# Altium PCB DFMM_2024.PcbDoc (part 1 of 2)
Units mil, origin at the board's own origin, x right, y up, seen from the top; angles counter-clockwise.
Board outline 3287.4 x 3929 mil, 4 copper layers (Top Layer, Top GND, Power Plane, Bottom GND/Signal), stack 23.756 mil thick; 158 components, 100 nets, 537 pads, 256 vias.
Unrouted connection lines stored in the file: 11.
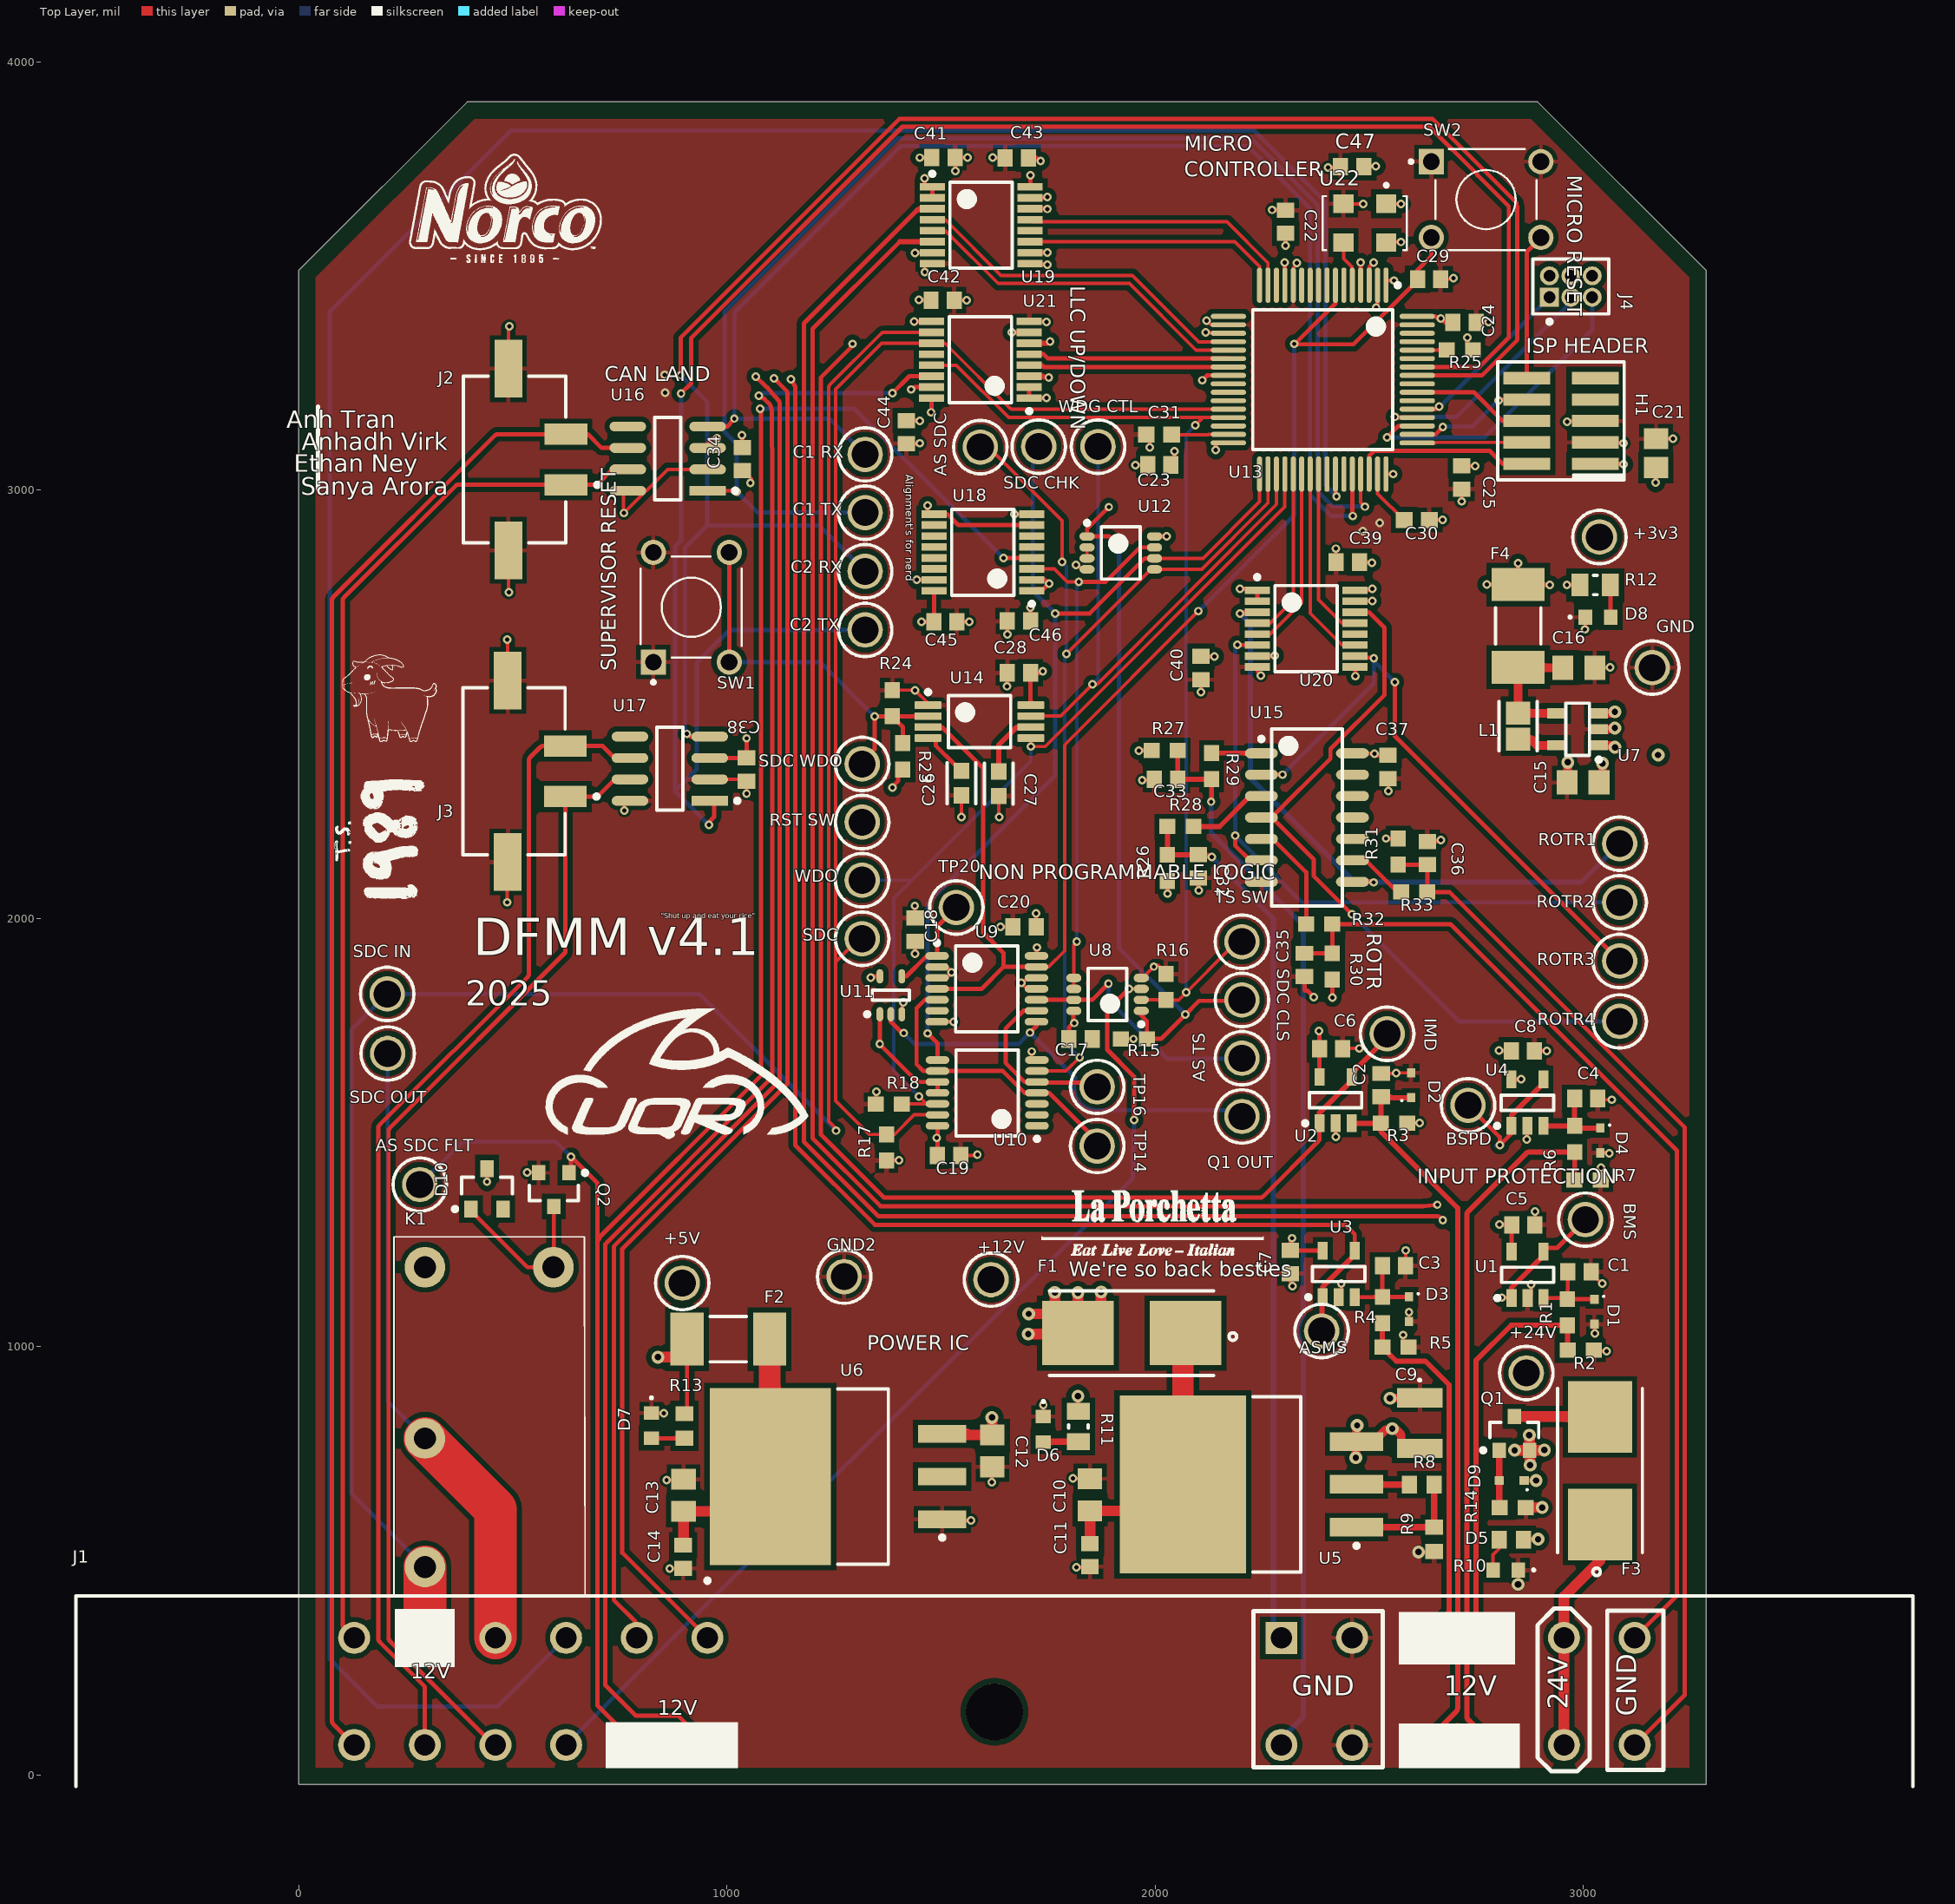
[diagram p0: Top Layer view]
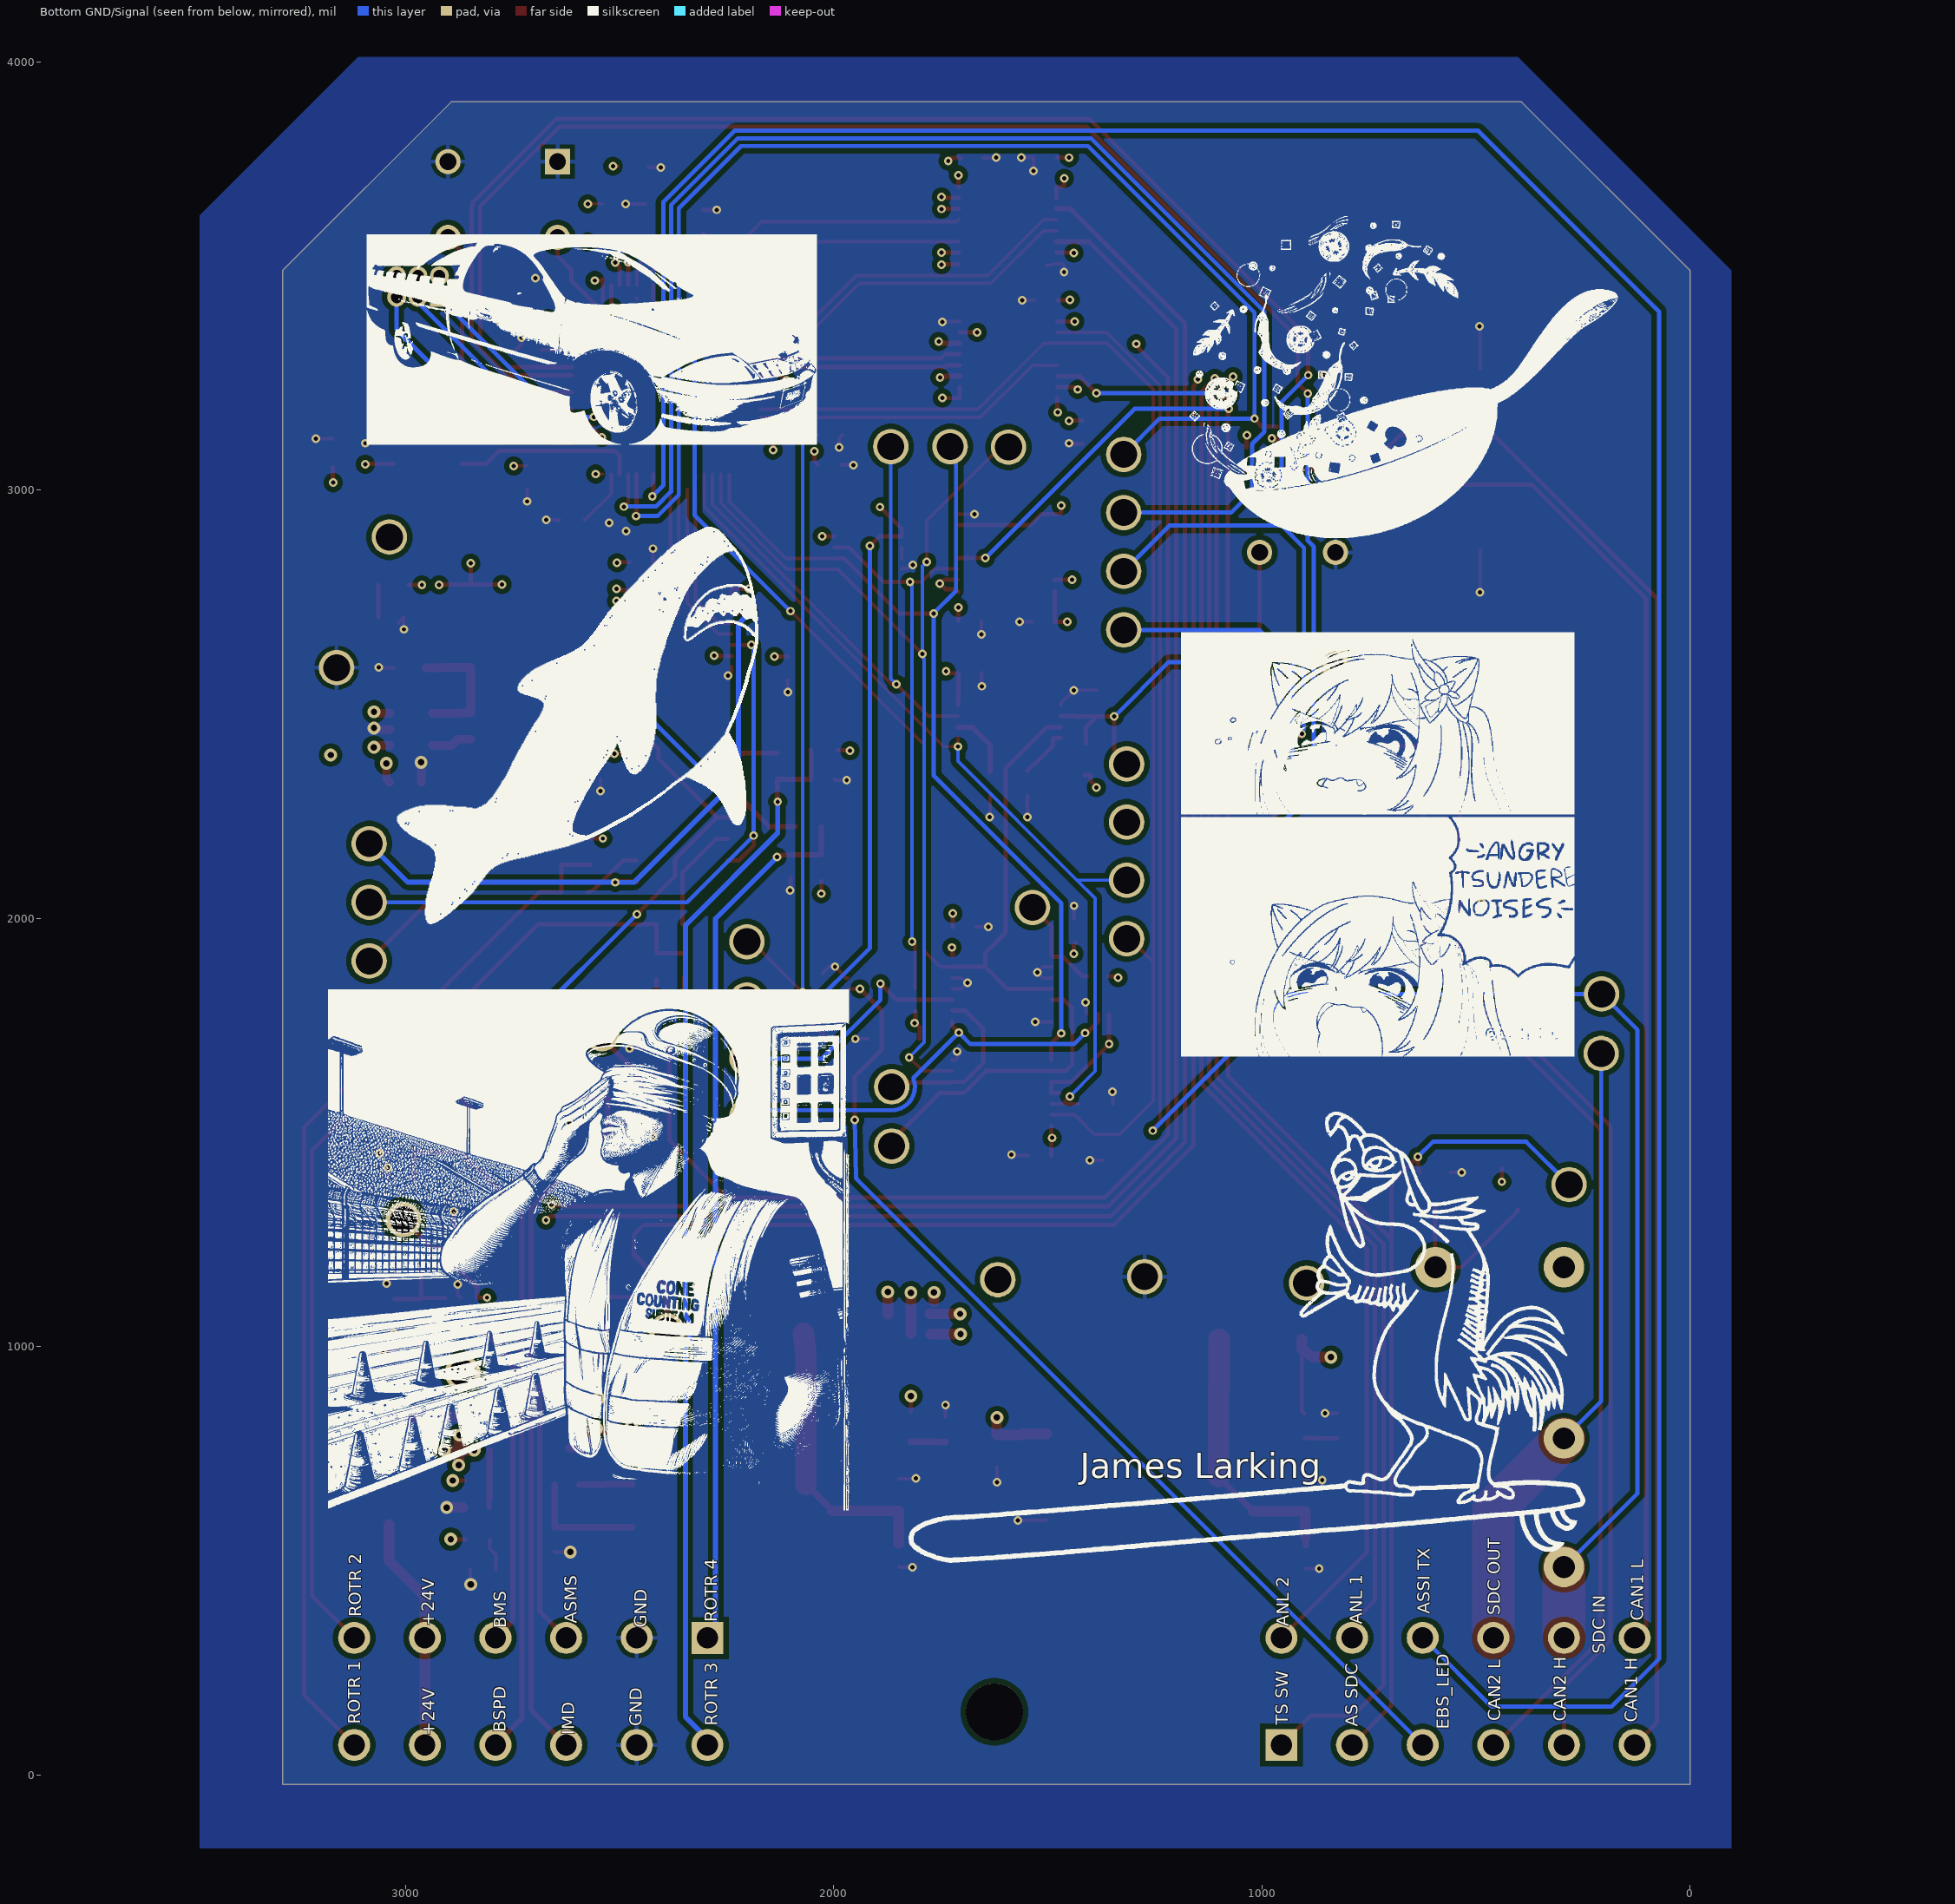
[diagram p1: Bottom GND/Signal view, seen from below]
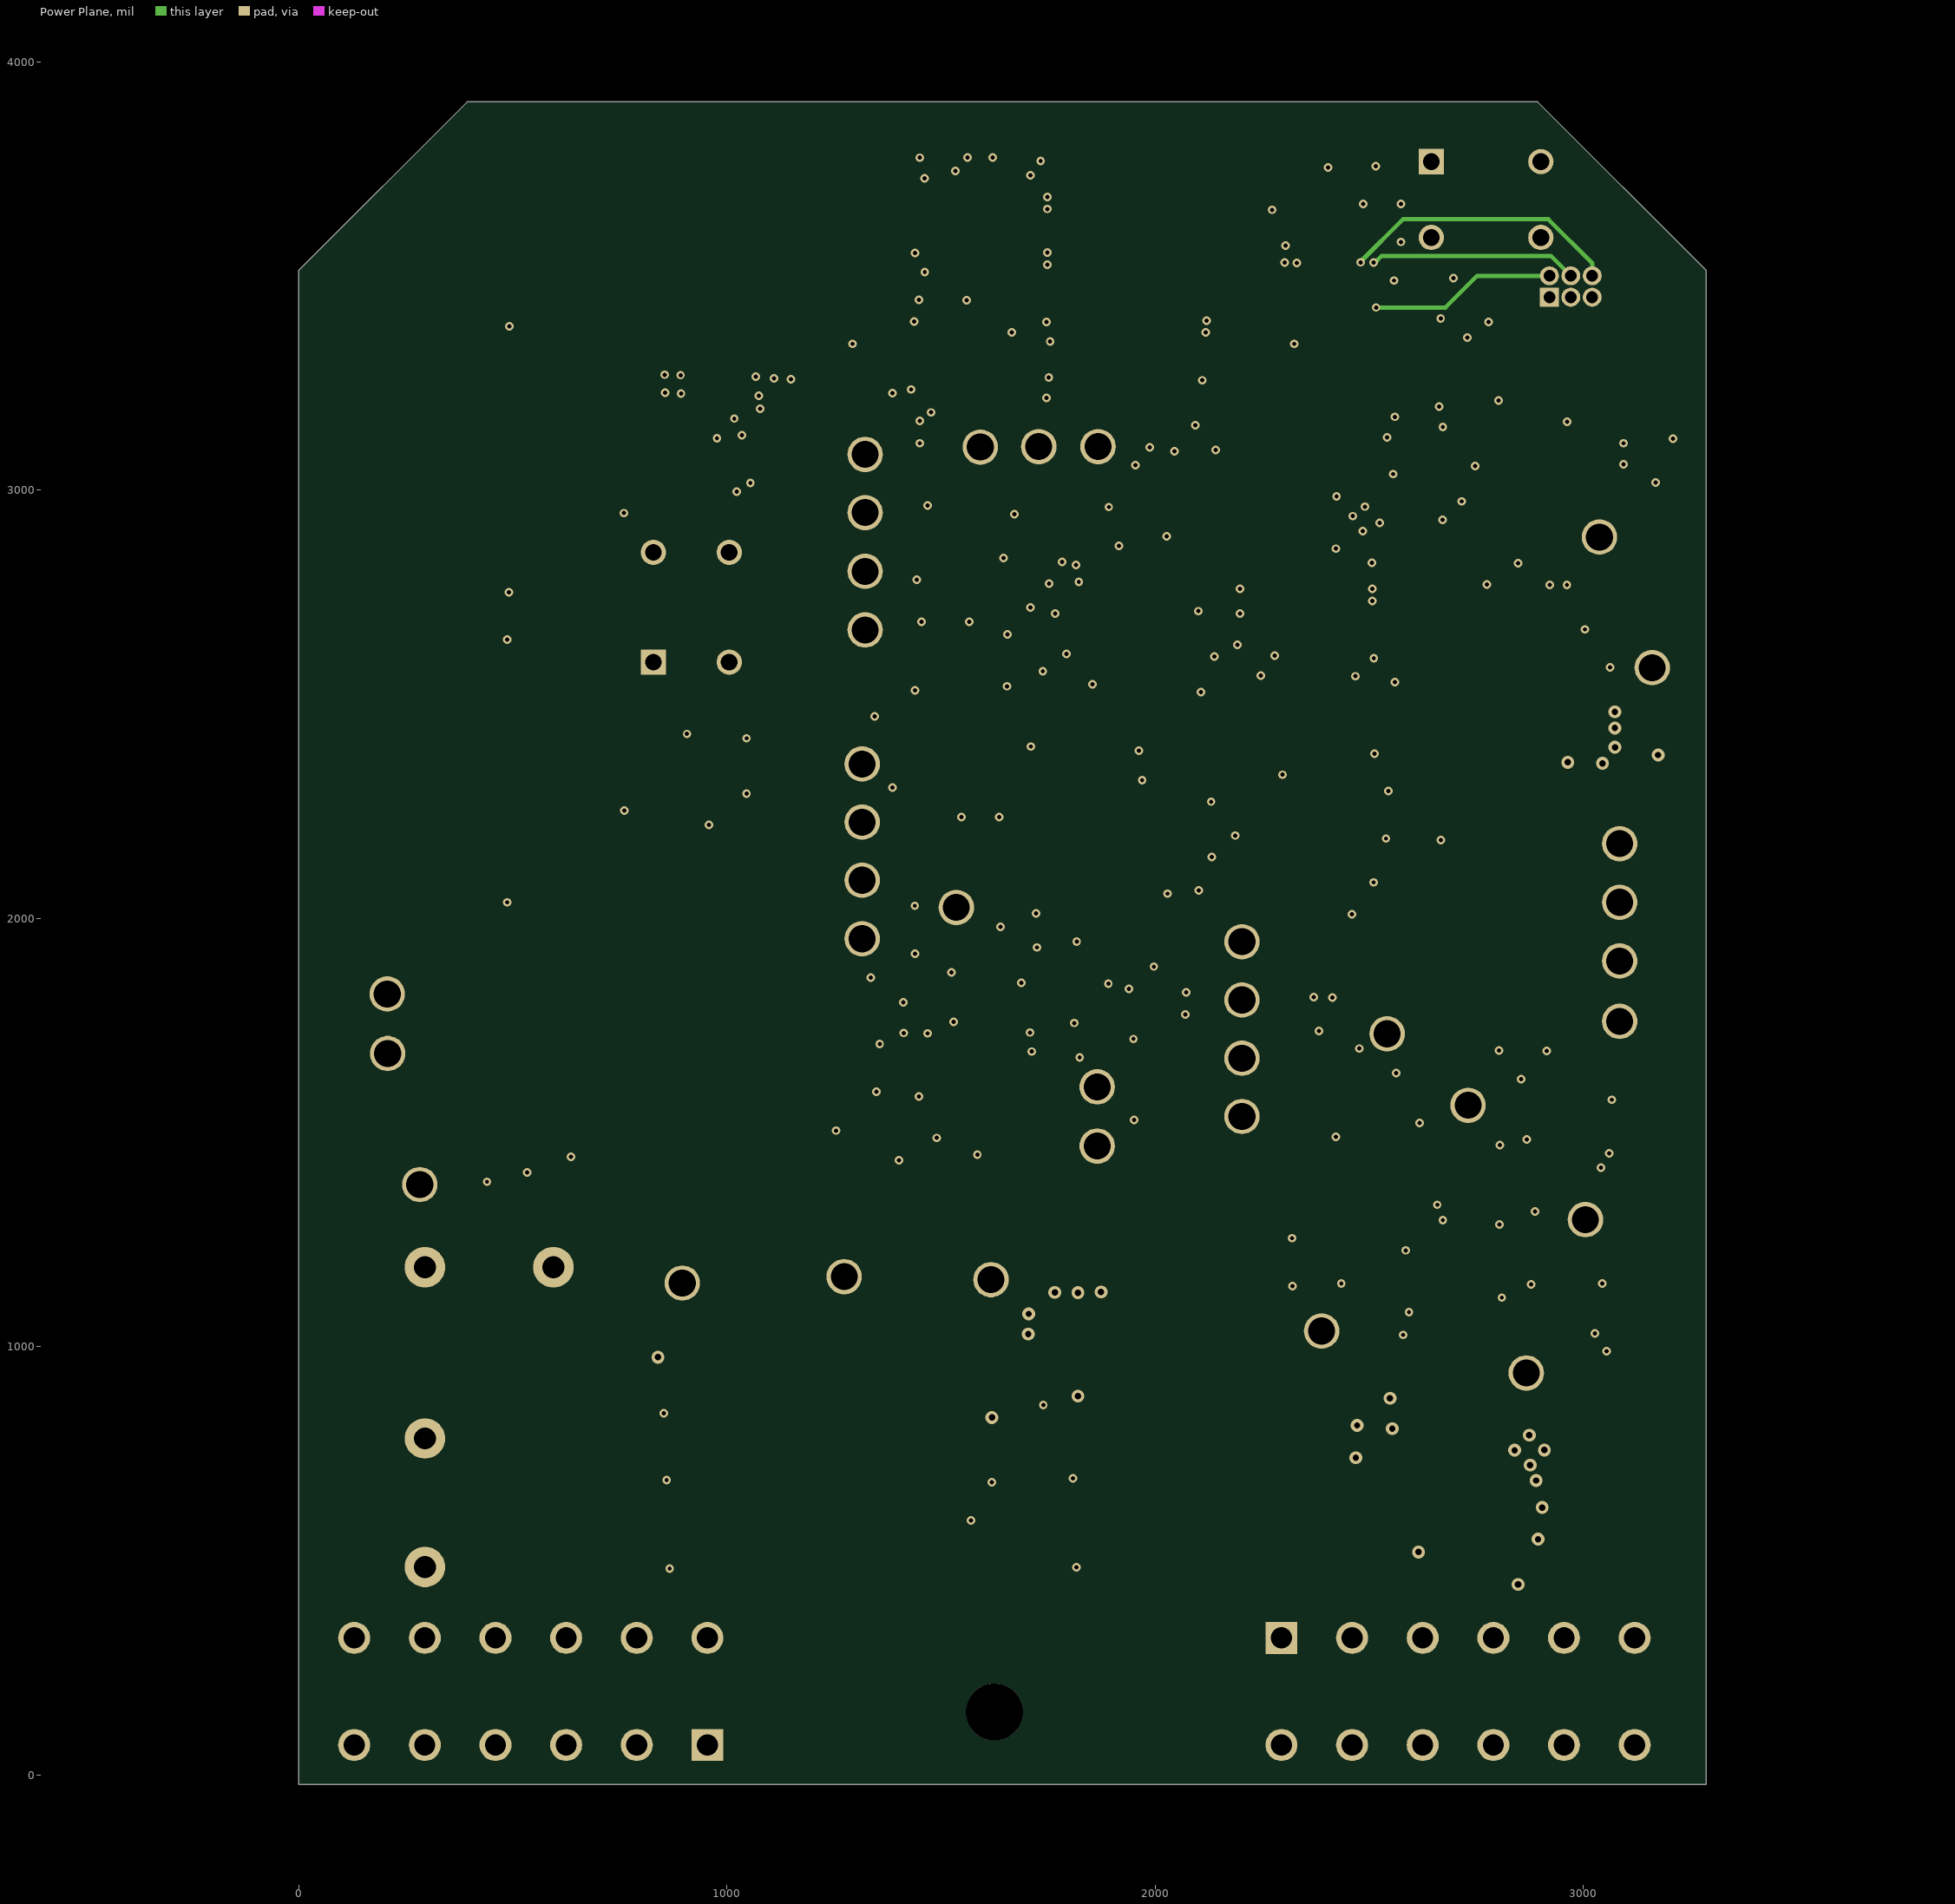
[diagram p2: Power Plane]
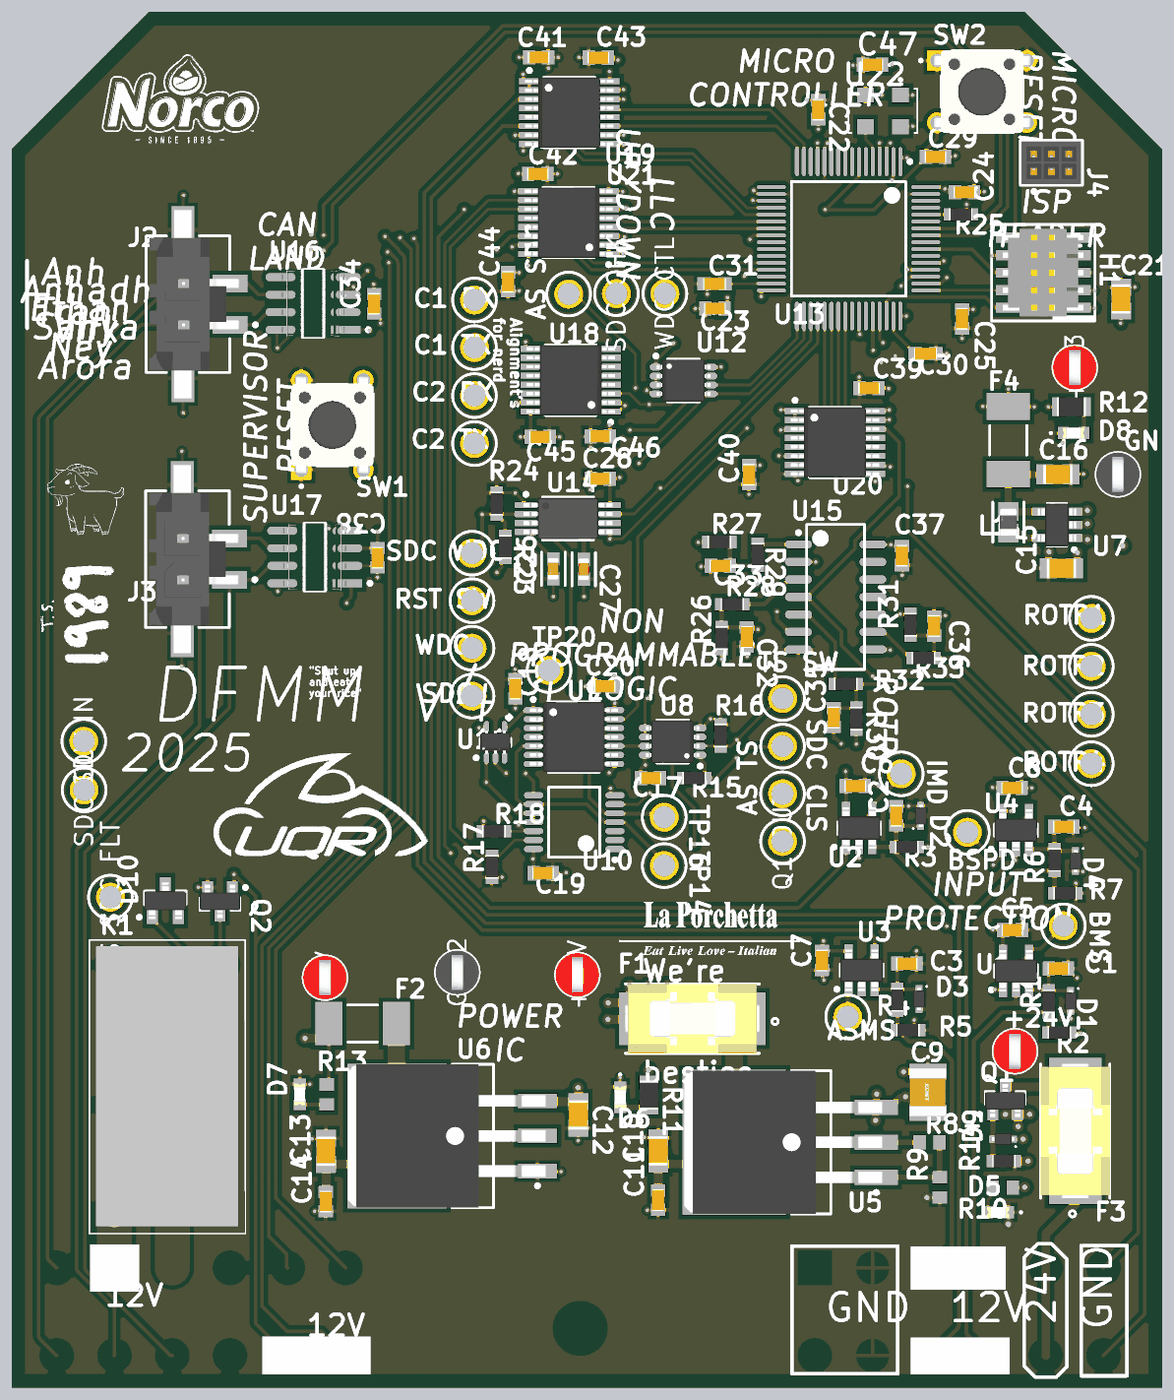
[diagram p4: 3D render of the assembled board from above, using the file's embedded part models]

## Layer stack, top to bottom
Top Solder: solder mask 0.4, Solder Resist, Dk 3.5
Top Layer: signal copper 1.4
Dielectric 2: prepreg 2.8, PP-006, Dk 4.1
Top GND: signal copper 1.378
Dielectric 1: dielectric 12.6, FR-4, Dk 4.8
Power Plane: signal copper 1.378
Dielectric 3: prepreg 2.8, PP-006, Dk 4.1
Bottom GND/Signal: signal copper 1.4
Bottom Solder: solder mask 0.4, Solder Resist, Dk 3.5

## Board outline
3287.4,3512.3 2893.7,3906 393.7,3906 0,3512.3 0,-23 3287.4,-23

## Design rules (kind name [scope] priority, off if disabled: settings)
AcuteAngle [All] p1: minimum=6.00000000000000E+0001 checktracksonly=TRUE
AssemblyTestPointUsage [(not InNetClass('NOTESTPOINTS'))] p1: allowmultiple=TRUE
AssemblyTestPointUsage AssemblyTestPointUsageN [InNetClass('NOTESTPOINTS')] p2: valid=2 allowmultiple=TRUE
AssemblyTestpoint [All] p1: testpointundercomponent=TRUE minsize=31.5 maxsize=78.74 preferedsize=39.37 minholesize=0 maxholesize=13.78 preferedholesize=0 testpointgrid=50 usegrid=FALSE gridoriginx=3444.88 gridoriginy=2460.63 gridtolerance=0.01 allowsidetop=TRUE minspacing=100 // Zollner
BoardOutlineClearance BoardCopperOutlineClearance [(OnLayer('Top Layer') OR OnLayer('Bottom Layer') )] p1: gap=19.68 ignorepadtopadclearanceinfootprint=FALSE except(39.37: Poly-OutlineEdge Region-OutlineEdge; 59.06: SMDPad-OutlineEdge THPad-OutlineEdge)
Clearance PadToViaClearance [IsVia and not IsComponentVia vs IsPad] p1: gap=1 ignorepadtopadclearanceinfootprint=TRUE
Clearance "Clearance (FAB)" [All] p2: gap=8 ignorepadtopadclearanceinfootprint=TRUE except(12: Arc-Poly Track-Poly SMDPad-Poly THPad-Poly Via-Poly Fill-Poly Poly-Poly)
ComponentClearance ComponentClearance_NetTie [((ObjectKind = 'Component') And (ComponentType = 'Net Tie')) Or (Footprint = 'StarPoint') Or (Footprint like 'NetTieVia*')] p1: gap=-150 collisioncheckmode=3 verticalgap=-150 showdistances=FALSE
ComponentClearance [All] p2: gap=10 collisioncheckmode=3 verticalgap=10 showdistances=FALSE
DiffPairsRouting [All] p1: maxlimit=50 minlimit=8 mostfreqgap=8 toplayer_minwidth=6 toplayer_maxwidth=100 toplayer_prefwidth=10 midlayer1_minwidth=6 midlayer1_maxwidth=100 midlayer1_prefwidth=10 midlayer2_minwidth=6 midlayer2_maxwidth=100 midlayer2_prefwidth=10 bottomlayer_minwidth=6 bottomlayer_maxwidth=100 bottomlayer_prefwidth=10 maxuncoupledlength=500
FabricationTestPointUsage [All] p1: valid=2 allowmultiple=FALSE
FabricationTestpoint [All] p1: side=3 testpointundercomponent=TRUE minsize=40 maxsize=100 preferedsize=60 minholesize=0 maxholesize=40 preferedholesize=32 testpointgrid=1 allowsidetop=TRUE allowsidebottom=TRUE usegrid=FALSE gridtolerance=0.01
HoleSize [All] p1: absolutevalues=TRUE maxlimit=250 minlimit=11.81 maxpercent=80.000 minpercent=20.000 // Zollner
HoleToHoleClearance HoleToHoleClearance_NetTieVia [InPadClass('NetTieVias') vs InPadClass('NetTieVias')] p1: gap=0 allowstackedmicrovias=TRUE
HoleToHoleClearance [All] p2: gap=9.84 allowstackedmicrovias=TRUE // Zollner
MinimumAnnularRing [All] p1: minimumring=5.91 // PCBWAY
MinimumSolderMaskSliver [All] p1: minsoldermaskwidth=7.87 // Zollner
PlaneClearance PlaneClearance_1 [All] p1: clearance=20
PlaneConnect [All] p1: pad.planeconnectstyle=Relief pad.reliefexpansion=20 pad.reliefentries=4 pad.reliefconductorwidth=10 pad.reliefairgap=10 via.planeconnectstyle=Direct via.reliefexpansion=20 via.reliefentries=4 via.reliefconductorwidth=10 via.reliefairgap=10
PolygonConnect DirectConnect [InNetClass('All Nets') vs InNetClass('All Nets')] p1: thpad.connectstyle=Relief thpad.reliefconductorwidth=10 thpad.reliefentries=4 thpad.polygonreliefangle="90 Angle" thpad.airgapwidth=10 smdpad.connectstyle=Direct smdpad.reliefconductorwidth=10 smdpad.reliefentries=4 smdpad.polygonreliefangle="90 Angle" smdpad.airgapwidth=10 via.connectstyle=Direct via.reliefconductorwidth=10 via.reliefentries=4 via.polygonreliefangle="90 Angle" via.airgapwidth=10
PolygonConnect [All] p2: thpad.connectstyle=Relief thpad.reliefconductorwidth=10 thpad.reliefentries=4 thpad.polygonreliefangle="90 Angle" thpad.airgapwidth=10 smdpad.connectstyle=Relief smdpad.reliefconductorwidth=10 smdpad.reliefentries=4 smdpad.polygonreliefangle="90 Angle" smdpad.airgapwidth=10 via.connectstyle=Direct via.reliefconductorwidth=10 via.reliefentries=4 via.polygonreliefangle="90 Angle" via.airgapwidth=10
RoutingVias SmallVias [All] p1: holewidth=10 width=20 viastyle="Through Hole" minholewidth=10 minwidth=20 maxholewidth=28 maxwidth=50
RoutingVias [All] p2: holewidth=13.78 width=27.56 viastyle="Through Hole" minholewidth=11.81 minwidth=23.62 maxholewidth=50 maxwidth=50
SMDEntry [not IsTestpoint] p1: side=TRUE corner=TRUE anyangle=FALSE
SMDNeckDown [not IsTestpoint] p1: percent=90.000
SMDToCorner [All] p1: distance=10000
SMDToPlane [All] p1: distance=0
ShortCircuit [All vs not IsBoardCutoutRegion] p1: allowed=FALSE
SilkToSolderMaskClearance [IsPad] p1: minsilkscreentomaskgap=5 clearancetoexposedcopper=TRUE
SolderMaskExpansion SolderMaskExpansion_Via [IsVia] p1: expansion=4 istentingtop=TRUE
SolderMaskExpansion [All] p2: expansion=1.97 istentingtop=FALSE // Zollner
SolderMaskExpansion SolderMaskExpansionToHoles [All] p3: expansion=3.94 istentingtop=FALSE soldermaskfromhole=TRUE // Zollner
UnRoutedNet [All] p1: checkbadconnections=TRUE
Width [All] p1: maxlimit=500 minlimit=8 preferedwidth=10
16 further rules are at their usual default settings.

## Classes and differential pairs
component class U_Non_Prog_Logic: "AS SDC" "AS SDC FLT" "AS TS" C17 C18 C19 C20 D10 K1 "Q1 Out" Q2 R15 R16 R17 R18 "RST SW" SDC "SDC CHK" "SDC CLS" TP14 TP16 TP20 "TS SW" U8 U9 U10 U11 U12 WDO
component class U_Microcontroller: "C1 RX" "C1 TX" "C2 RX" "C2 TX" C21 C22 C23 C24 C25 C26 C27 C28 C29 C30 C31 C32 C33 C34 C35 C36 C37 C38 C39 C40 C41 C42 C43 C44 C45 C46 C47 H1 J2 J3 J4 R23 R24 R26 R27 R28 R29 R30 R31 R32 R33 ROTR1 ROTR2 ROTR3 ROTR4 "SDC WDO" SW1 SW2 U13 U14 U15 U16 U17 U18 U19 U20 U21 U22 "WDG CTL"
component class DFMM_2024: +3v3 +5V +12V +24V ASMS BMS BSPD C1 C2 C3 C4 C5 C6 C7 C8 C9 C10 C11 C12 C13 C14 C15 C16 D1 D2 D3 D4 D5 D6 D7 D8 D9 F1 F2 F3 F4 GND GND2 IMD J1 L1 Q1 R1 R2 R3 R4 R5 R6 R7 R8 R9 R10 R11 R12 R13 R14 "SDC IN" "SDC OUT" U1 U2 U3 U4 U5 U6 U7

## Components (designator, comment, footprint, x,y, rotation, side; value= is the part's Value field where it differs from the comment)
+3v3 "5010" KSTN-5010_V 3037.84,2889.89 r90 top
+5V "5010" KSTN-5010_V 896,1148 r90 top
+12V "5010" KSTN-5010_V 1617,1156 r90 top
+24V "5010" KSTN-5010_V 2867,938 r90 top
"AS SDC" "5012" KSTN-5012_V 1592,3100 r90 top
"AS SDC FLT" "5012" KSTN-5012_V 283,1378 r90 top
"AS TS" "5012" KSTN-5012_V 2203,1673 r90 top
ASMS "5012" KSTN-5012_V 2389,1036 r90 top
BMS "5012" KSTN-5012_V 3005,1296 r90 top
BSPD "5012" KSTN-5012_V 2731,1563 r90 top
C1 "CL10B104KB8NNWC" CAPC1608X09M 2990.96,1174.43 r180 top value=0.1uF
"C1 RX" "5012" KSTN-5012_V 1323,3083 r90 top
"C1 TX" "5012" KSTN-5012_V 1323,2947 r90 top
C2 "CL10B104KB8NNWC" CAPC1608X09M 2528,1610.17 r270 top value=0.1uF
"C2 RX" "5012" KSTN-5012_V 1323,2810 r90 top
"C2 TX" "5012" KSTN-5012_V 1323,2673 r90 top
C3 "CL10B104KB8NNWC" CAPC1608X09M 2558.18,1188.36 r180 top value=0.1uF
C4 "CL10B104KB8NNWC" CAPC1608X09M 3006.83,1579 r180 top value=0.1uF
C5 "CL10B104KB8NNWC" CAPC1608X09M 2859.83,1284 r180 top value=0.1uF
C6 "CL10B104KB8NNWC" CAPC1608X09M 2411,1695 r180 top value=0.1uF
C7 "CL10B104KB8NNWC" CAPC1608X09M 2316,1197 r90 top value=0.1uF
C8 "CL10B104KB8NNWC" CAPC1608X09M 2858.83,1690 r180 top value=0.1uF
C9 "C1210C106K3RACAUTO" C1210 2618,821 r270 top
C10 "CL21A106KOQNNNE" CAPC2012X14N#1 1848,653.6 r90 top value=10uF
C11 "CL10B104KB8NNWC" CAPC1608X09M 1848,512.83 r90 top value=0.1uF
C12 "CL21A106KOQNNNE" CAPC2012X14N#1 1620,756 r270 top value=10uF
C13 "CL21A106KOQNNNE" CAPC2012X14N#1 899,652.4 r90 top value=10uF
C14 "CL10B104KB8NNWC" CAPC1608X09M 898,508.83 r90 top value=0.1uF
C15 "CL21A106KOQNNNE" CAPC2012X14N#1 2999.6,2317 r180 top value=10uF
C16 "CL21A226MQQNNNE" CAPC2012X14N#1 2989.6,2585 r0 top value=22uF
C17 "CL10B104KB8NNWC" CAPC1608X09M 1826,1718 r0 top value=0.1uF
C18 "CL10B104KB8NNWC" CAPC1608X09M 1440,1973 r90 top value=0.1uF
C19 "CL10B104KB8NNWC" CAPC1608X09M 1519,1446 r0 top value=0.1uF
C20 "CL10B104KB8NNWC" CAPC1608X09M 1695.17,1980 r180 top value=0.1uF
C21 "CL21A475KAQNNNE" CAPC2012X14N#2 3170,3086 r90 top value=4.7uF
C22 "CL10B104KB8NNWC" CAPC1608X09M 2305,3626.33 r270 top value=0.1uF
C23 "CL10B104KB8NNWC" CAPC1608X09M 2009.81,3058.5 r0 top value=0.1uF
C24 "CL10B104KB8NNWC" CAPC1608X09M 2723,3391 r180 top value=0.1uF
C25 "CL10B104KB8NNWC" CAPC1608X09M 2716,3029.17 r90 top value=0.1uF
C26 "GCM1885C1H392JA16D" FP-GCM188-0_1-IPC_B 1548,2315.39 r270 top value=3.9nF
C27 "GCM1885C1H392JA16D" FP-GCM188-0_1-IPC_B 1635,2314 r270 top value=3.9nF
C28 "CL10B104KB8NNWC" CAPC1608X09M 1682,2573 r180 top value=0.1uF
C29 "CL10B104KB8NNWC" CAPC1608X09M 2640,3492 r180 top value=0.1uF
C30 "CL10A225KO8NNNC" CAPC1608X09N 2611.47,2930 r0 top value=2.2uF
C31 "CL10A225KO8NNNC" CAPC1608X09N 2009,3129 r180 top value=2.2uF
C32 "CL10B104KB8NNWC" CAPC1608X09M 2101,2120.83 r90 top value=0.1uF
C33 "CL10B104KB8NNWC" CAPC1608X09M 2025.83,2324 r0 top value=0.1uF
C34 "CL10B104KB8NNWC" CAPC1608X09M 1036,3072 r270 top value=0.1uF
C35 "CL10B104KB8NNWC" CAPC1608X09M 2349,1890.83 r90 top value=0.1uF
C36 "CL10B104KB8NNWC" CAPC1608X09M 2636,2152.17 r270 top value=0.1uF
C37 "CL10B104KB8NNWC" CAPC1608X09M 2544,2353 r90 top value=0.1uF
C38 "CL10B104KB8NNWC" CAPC1608X09M 1046,2347 r270 top value=0.1uF
C39 "CL10B104KB8NNWC" CAPC1608X09M 2450.17,2831.41 r180 top value=0.1uF
C40 "CL10B104KB8NNWC" CAPC1608X09M 2107,2584 r270 top value=0.1uF
C41 "CL10B104KB8NNWC" CAPC1608X09M 1506.17,3776 r180 top value=0.1uF
C42 "CL10B104KB8NNWC" CAPC1608X09M 1504.17,3443 r180 top value=0.1uF
C43 "CL10B104KB8NNWC" CAPC1608X09M 1677,3775 r180 top value=0.1uF
C44 "CL10B104KB8NNWC" CAPC1608X09M 1419,3135 r270 top value=0.1uF
C45 "CL10B104KB8NNWC" CAPC1608X09M 1510.33,2692 r180 top value=0.1uF
C46 "CL10B104KB8NNWC" CAPC1608X09M 1682.17,2694 r180 top value=0.1uF
C47 "CL10B104KB8NNWC" CAPC1608X09M 2460,3755 r0 top value=0.1uF
D1 "PZS1116BES_R1_00001" SODFL160X65-2N 3026,1081.13 r270 top
D2 "PZS1116BES_R1_00001" SODFL160X65-2N 2598,1609.94 r90 top
D3 "PZS1116BES_R1_00001" SODFL160X65-2N 2593,1087.13 r270 top
D4 "PZS1116BES_R1_00001" SODFL160X65-2N 3040,1481 r270 top
D5 "LTST-C191KGKT" LTST-C191KSKT 2819,478 r0 top
D6 "LTST-C191KGKT" LTST-C191KSKT 1739,806.57 r90 top
D7 "LTST-C191KGKT" LTST-C191KSKT 824,815 r90 top
D8 "LTST-C191KGKT" LTST-C191KSKT 3034.43,2703 r180 top
D9 "PZS1116BES_R1_00001" SODFL160X65-2N 2833,687 r180 top
D10 "BAT54LT1G" SOT95P237X111-3N 440,1368 r90 top
F1 "0154001.DR" 0154001.DRFP 1945.41,1031 r180 top
F2 "0452.500MRL" LFUS-0452_V 1003.54,1017 r180 top
F3 "0154001.DR" 0154001.DRFP 3039,710 r90 top
F4 "0452.500MRL" LFUS-0452_V 2848,2682.46 r90 top
GND "5011" KSTN-5011_V 3161,2585 r90 top
GND2 "5011" KSTN-5011_V 1274,1163 r90 top
H1 "miniSWD" miniSWD-Footprint-1 2948,3161 r90 top
IMD "5012" KSTN-5012_V 2542,1730 r90 top
J1 "DTM13-12PA-12PB" DTM13-12PA-12PB-Footprint-1 1624.92,-334.35 r0 top locked
J2 "43650-0225" FP-43650-0225-MFG 504.57,3071.01 r270 top
J3 "43650-0225" FP-43650-0225-MFG 502.92,2343.06 r270 top
J4 "M50-3000345" FP-M50-3000345-MFG 2971,3475 r0 top
K1 "G5Q-1A4 DC12" "G5Q-1A4 DC12" 295,1185 r270 top
L1 "MLP2012S1R0MT0S1" FP-MLZ2012-0_85-IPC_B 2848,2448.45 r90 top
Q1 "DMP3098L-7" SOT90P240X110-3N 2839,797 r90 top
"Q1 OUT" "5012" KSTN-5012_V 2203,1537 r90 top
Q2 "DMN6075S-7" SOT90P240X110-3N 596,1366 r270 top
R1 "ESR03EZPJ103" RESC1608X06N 2963.01,1079.94 r90 top value=10k
R2 "ESR03EZPJ103" RESC1608X06N 2994,991 r180 top value=10k
R3 "RC0603FR-072K2L" RESC1608X06N 2558,1521 r180 top value=2.2k
R4 "ESR03EZPJ103" RESC1608X06N 2531.02,1085.02 r90 top value=10k
R5 "ESR03EZPJ103" RESC1608X06N 2561.49,998.13 r180 top value=10k
R6 "ESR03EZPJ103" RESC1608X06N 2980,1484.49 r90 top value=10k
R7 "ESR03EZPJ103" RESC1608X06N 3010,1389 r180 top value=10k
R8 "121" RESC1608X55X30ML15T15 2623,677.54 r0 top
R9 "1.05k" RESC1608X55X30ML15T15 2652,549.54 r270 top
R10 "1.05k" RESC1608X55X30ML15T15 2832,549 r180 top
R11 "RC0805JR-07510RL" RESC2012X06N 1821,813 r90 top value=510
R12 "RC0805FR-0780R6L" RESC2012X06N 3028,2778 r180 top value=80
R13 "121" RESC1608X55X30ML15T15 901,814.46 r270 top
R14 "RNCP0603FTD1K00" RESC1608X06N 2835.51,624 r180 top value=1K
R15 "ESR03EZPJ103" RESC1608X06N 1950.49,1718 r180 top value=10k
R16 "ESR03EZPJ103" RESC1608X06N 2026,1839.51 r90 top value=10k
R17 "ESR03EZPJ103" RESC1608X06N 1373,1464.49 r270 top value=10k
R18 "ESR03EZPJ103" RESC1608X06N 1378.49,1566 r180 top value=10k
R23 "RC0603FR-071ML" RESC1608X06N 1411,2378 r270 top value=1M
R24 "RC0603FR-102ML" RESC1608X06N 1386,2502 r270 top value=2M
R25 "ESR03EZPJ103" RESC1608X06N 2712,3327 r180 top value=10k
R26 "ESR03EZPJ103" RESC1608X06N 2029,2117.49 r90 top value=10k
R27 "ESR03EZPJ103" RESC1608X06N 2022.49,2392 r0 top value=10k
R28 "ESR03EZPJ103" RESC1608X06N 2059.49,2214 r0 top value=10k
R29 "ESR03EZPJ103" RESC1608X06N 2132,2355 r90 top value=10k
R30 "ESR03EZPJ103" RESC1608X06N 2414,1887.49 r90 top value=10k
R31 "ESR03EZPJ103" RESC1608X06N 2568,2155.51 r270 top value=10k
R32 "ESR03EZPJ103" RESC1608X06N 2383.49,1986 r180 top value=10k
R33 "ESR03EZPJ103" RESC1608X06N 2605.49,2061 r180 top value=10k
ROTR1 "5012" KSTN-5012_V 3085,2174 r90 top
ROTR2 "5012" KSTN-5012_V 3085,2037 r90 top
ROTR3 "5012" KSTN-5012_V 3085,1900 r90 top
ROTR4 "5012" KSTN-5012_V 3085,1759 r90 top
"RST SW" "5012" KSTN-5012_V 1316,2224.33 r90 top
SDC "5012" KSTN-5012_V 1316,1952 r90 top
"SDC CHK" "5012" KSTN-5012_V 1728.5,3101 r90 top
"SDC CLS" "5012" KSTN-5012_V 2203,1809 r90 top
"SDC IN" "5012" KSTN-5012_V 207,1823 r90 top
"SDC OUT" "5012" KSTN-5012_V 208,1684 r90 top
"SDC WDO" "5012" KSTN-5012_V 1316,2360 r90 top
SW1 "1825910-6" SW1825910-6 917,2726 r90 top
SW2 "1825910-6" SW1825910-6 2773,3678 r0 top
TP14 "5012" KSTN-5012_V 1865,1468 r90 top
TP16 "5012" KSTN-5012_V 1865,1606 r90 top
TP20 "5012" KSTN-5012_V 1536,2025 r90 top
"TS SW" "5012" KSTN-5012_V 2203,1945 r90 top
U1 "TLV271CW5-7" SOT95P285X130-5N 2870,1167.13 r90 top
U2 "TLV271CW5-7" SOT95P285X130-5N 2421.6,1575.13 r90 top
U3 "TLV271CW5-7" SOT95P285X130-5N 2429,1169.13 r90 top
U4 "TLV271CW5-7" SOT95P285X130-5N 2869.6,1569.13 r90 top
U5 "LM1085IS-ADJ/NOPB" KTT0003B_M 2224.45,678 r180 top
U6 "LM1085ISX-5.0/NOPB" KTT0003B_N 1259,696 r180 top
U7 "SC189ZSKTRT" SOT95P280X145-5N 2987,2441 r180 top
U8 "74HCT2G00DP,125" TSOP65P400X110-8N 1889,1822 r180 top
U9 "SN74HCS74QBQARQ1" TSOP65P640X120-14N 1607,1835 r0 top
U10 "74HCT08PW118" TSOP65P640X110-14N 1608,1592 r180 top
U11 "74AHCT1G32GW125" TSOP65P210X110-6N 1383,1820 r90 top
U12 "74HC2G08DP,125" TSOP65P490X108-8N 1920,2853 r0 top
U13 "STM32F415RGT6" STM-LQFP64_M 2391.73,3257.53 r270 top
U14 "UCC2946TPWRQ1" PW0008A_M 1590,2459 r0 top
U15 "CD40106BM96E4" D0014A_L 2354.7,2235 r0 top
U16 "SN65HVD233QDRQ1" FP-D0008A-IPC_B 862,3073 r180 top
U17 "SN65HVD233QDRQ1" FP-D0008A-IPC_B 867,2349 r180 top
U18 "CD40109BPWR" TSOP65P640X120-16N 1598,2854 r180 top
U19 "CD40109BPWR" TSOP65P640X120-16N 1594,3618 r0 top
U20 "CD40109BPWR" TSOP65P640X120-16N 2352.83,2676.2 r0 top
U21 "CD40109BPWR" TSOP65P640X120-16N 1592,3304 r180 top
U22 "ASFLMB-24.000MHZ-XY-T" XTAL_ASFLMB-24.000MHZ-XY-T 2490,3623 r270 top
"WDG CTL" "5012" KSTN-5012_V 1867,3101 r90 top
WDO "5012" KSTN-5012_V 1316,2088.67 r90 top

## Footprints (in the part's own frame and the unit in brackets; to place one, negate y for a bottom-side part, rotate by r counter-clockwise, add the part's x,y. Pads: shape width x height; smd on the part's side, far side on the other; paste and mask are expansions set on the pad)
0154001.DRFP [mm]
  rect 4.24x3.81 smd: 1(-3.19,0) 2(3.19,0)
  silkscreen extent -6.22,-2.51 4.86,2.51, body extent -4.86,-2.51 4.86,2.51, height 3.81
C1210 [mm]
  rect 1.15x2.7 smd: 1(-1.5,0) 2(1.5,0)
  silkscreen extent -2.6,-0.05 -2.5,0.05, body extent -1.75,-1.36 1.75,1.36, height 2.8
CAPC1608X09M [mm] "Chip Capacitor, 2-Leads, Body 1.55x0.80mm, IPC Low Density"
  rect 0.9x1.04 smd: 1(-0.69,0) 2(0.69,0)
  body extent -0.8,-0.45 0.8,0.45, height 0.9
CAPC1608X09N [mm] "Chip Capacitor, 2-Leads, Body 1.60x0.80mm, IPC Medium Density"
  rect 1x0.95 smd: 1(-0.75,0) 2(0.75,0)
  body extent -0.85,-0.45 0.85,0.45, height 0.9
CAPC2012X14N#1 [mm] "Chip Capacitor, 2-Leads, Body 2.00x1.25mm, IPC Medium Density"
  rect 1.25x1.45 smd: 1(-0.95,0) 2(0.95,0)
  body extent -1.07,-0.7 1.07,0.7, height 1.4
CAPC2012X14N#2 [mm] "Chip Capacitor, 2-Leads, Body 2.00x1.25mm, IPC Medium Density"
  rect 1.25x1.45 smd: 1(-0.85,0) 2(0.85,0)
  body extent -1.07,-0.7 1.07,0.7, height 1.4
D0014A_L [mm] "SOIC, 14-Leads, Body 8.75x4mm, Pitch 1.27mm, IPC High Density"
  oval 1.95x0.6 smd: 1(-2.7,3.81) 2(-2.7,2.54) 3(-2.7,1.27) 4(-2.7,0) 5(-2.7,-1.27) 6(-2.7,-2.54) 7(-2.7,-3.81) 8(2.7,-3.81) 9(2.7,-2.54) 10(2.7,-1.27) 11(2.7,0) 12(2.7,1.27) 13(2.7,2.54) 14(2.7,3.81)
  silkscreen extent -2.82,-5.25 2.1,5.25, body extent -2.5,-5.25 2.5,5.25, height 2
DTM13-12PA-12PB-Footprint-1 [mm]
  rect 1.9x1.9 hole 1.25 paste-2539.97 mask+0: A1(-17.025,10.255) B1(17.025,16.605)
  round 1.9 hole 1.25 paste-2539.97 mask+0: A2(-21.215,10.255) A3(-25.405,10.255) A4(-29.595,10.255) A5(-33.785,10.255) A6(-37.975,10.255) A7(-37.975,16.605) A8(-33.785,16.605) A9(-29.595,16.605) A10(-25.405,16.605) A11(-21.215,16.605) A12(-17.025,16.605) B2(21.215,16.605) B3(25.405,16.605) B4(29.595,16.605) B5(33.785,16.605) B6(37.975,16.605) B7(37.975,10.255) B8(33.785,10.255) B9(29.595,10.255) B10(25.405,10.255) B11(21.215,10.255) B12(17.025,10.255)
  round 3.38 hole 3.38 unplated paste-2539.97 mask+0: ""(0,12.215)
  silkscreen extent -54.47,7.81 54.47,20.12, body extent -54.57,-19.2 54.57,19.2, height 0.25
FP-43650-0225-MFG [mm]
  rect 1.27x2.54 smd paste+0 mask+0: 1(1.5,3.05) 2(-1.5,3.05)
  rect 3.43x1.65 smd paste+0 mask+0: 3(-5.385,-0.37) 4(5.385,-0.37)
  silkscreen extent -4.95,-3.04 4.95,5.02, body extent -7.2,-3.14 7.2,4.42, height 0.25
FP-D0008A-IPC_B [mil]
  rect 85.4x22.92 smd paste+0 mask+0: 1(-93.06,75)
  rrect100% 85.4x22.92 smd paste+0 mask+0: 2(-93.06,25) 3(-93.06,-25) 4(-93.06,-75) 5(93.06,-75) 6(93.06,-25) 7(93.06,25) 8(93.06,75)
  silkscreen extent -162,-97 31,97, body extent -146,-106 146,106, height 10
FP-GCM188-0_1-IPC_B [mil]
  rect 37.74x35.91 smd paste+0 mask+0: 1(-28.61,0) 2(28.61,0)
  silkscreen extent -47,-34 47,34, body extent -57,-28 57,28, height 10
FP-M50-3000345-MFG [mm]
  rect 1.12x1.12 hole 0.7 paste-2539.97 mask+0: 1(-1.27,-0.635)
  round 1.12 hole 0.7 paste-2539.97 mask+0: 2(-1.27,0.635) 3(0,-0.635) 4(0,0.635) 5(1.27,-0.635) 6(1.27,0.635)
  silkscreen extent -2.25,-2.21 2.25,1.63, body extent -2.35,-1.73 2.35,1.73, height 0.25
FP-MLZ2012-0_85-IPC_B [mil]
  rect 53.32x57.33 smd paste+0 mask+0: 1(-30.55,0) 2(30.55,0)
  silkscreen extent -57,-44 57,44, body extent -67,-39 67,39, height 10
"G5Q-1A4 DC12" [mm]
  round 2.4 hole 1.3: 1(0,0) 2(10.16,0) 3(17.78,0) 5(0,7.62)
  silkscreen extent -1.8,-1.83 19.5,9.5, body extent -1.33,-1.34 18.97,8.96, height 16.2
KSTN-5010_V [mm] "Test Point, Dia 3.17mm"
  round 2.1 hole 1.6: 1(0,0)
  silkscreen extent -1.58,-1.59 1.58,1.59, body extent -1.59,-1.59 1.59,1.59, height 8.13
KSTN-5011_V [mm] "Test Point, Dia 3.17mm"
  round 2.1 hole 1.6: 1(0,0)
  silkscreen extent -1.58,-1.59 1.58,1.59, body extent -1.59,-1.59 1.59,1.59, height 8.13
KSTN-5012_V [mm] "Test Point, Dia 3.17mm"
  round 2.1 hole 1.6: 1(0,0)
  silkscreen extent -1.58,-1.59 1.58,1.59, body extent -1.59,-1.59 1.59,1.59, height 8.13
KTT0003B_M [mm] "D2-PAK, 3-Leads, Body 10.41x8.89mm, Pitch 2.54mm, IPC Low Density"
  rect 3.15x1.1 smd: 1(-6.25,2.54) 2(-6.25,0) 3(-6.25,-2.54)
  rect 7.5x10.55 smd: 4(4.05,0)
  silkscreen extent -6.38,-5.2 -0.1,5.2, body extent -6.67,-5.2 7.68,5.2, height 4.64
KTT0003B_N [mm] "D2-PAK, 3-Leads, Body 10.41x8.89mm, Pitch 2.54mm, IPC Medium Density"
  rect 2.85x1.05 smd: 1(-6.2,2.54) 2(-6.2,0) 3(-6.2,-2.54)
  rect 7.2x10.5 smd: 4(4,0)
  silkscreen extent -6.33,-5.2 0,5.2, body extent -6.78,-5.2 7.57,5.2, height 4.64
LFUS-0452_V [mm] "SMD, 2-Leads, Body 6.1x2.69mm"
  rect 1.96x3.15 smd: 1(-2.45,0) 2(2.45,0)
  silkscreen extent -1.07,-1.35 1.07,1.35, body extent -3.05,-1.34 3.05,1.34, height 2.69
LTST-C191KSKT [mm]
  rect 0.8x0.9 smd: 1(-0.751,0) 2(0.751,0)
  silkscreen extent 1.63,-0.03 1.68,0.03, body extent -0.8,-0.4 0.8,0.4, height 0.55
miniSWD-Footprint-1 [mil]
  rect 29x110 smd mask+2: 1(-100,-80) 2(-100,80) 3(-50,-80) 4(-50,80) 5(0,-80) 6(0,80) 7(50,-80) 8(50,80) 9(100,-80) 10(100,80)
  silkscreen extent -138,-148 138,148, body extent -125,-114 125,116, height 245
PW0008A_M [mm] "SOP, 8-Leads, Body 4.5x3.1mm, Pitch 0.65mm, IPC Low Density"
  rrect22% 1.6x0.45 smd: 1(-3.05,0.975) 2(-3.05,0.325) 3(-3.05,-0.325) 4(-3.05,-0.975) 5(3.05,-0.975) 6(3.05,-0.325) 7(3.05,0.325) 8(3.05,0.975)
  silkscreen extent -3.17,-1.55 1.85,1.87, body extent -3.23,-1.5 3.23,1.5, height 1.2
RESC1608X06N [mm] "Chip Resistor, 2-Leads, Body 1.60x0.80mm, IPC Medium Density"
  rect 0.95x0.9 smd: 1(-0.775,0) 2(0.775,0)
  body extent -0.85,-0.45 0.85,0.45, height 0.55
RESC1608X55X30ML15T15 [mm] "Chip Resistor, 2-Leads, Body 1.60x0.80mm, IPC Low Density"
  rect 0.9x1.05 smd: 1(-0.725,0) 2(0.725,0)
  body extent -0.87,-0.48 0.87,0.48, height 0.55
RESC2012X06N [mm] "Chip Resistor, 2-Leads, Body 2.00x1.25mm, IPC Medium Density"
  rect 1x1.35 smd: 1(-0.9,0) 2(0.9,0)
  silkscreen extent -0.1,-0.58 0.1,0.58, body extent -1.05,-0.67 1.05,0.67, height 0.6
SODFL160X65-2N [mm] "SODFL, 2-Leads, Body 0.80x1.60mm, IPC Medium Density"
  rect 0.55x0.5 smd: 1(-0.735,0) 2(0.735,0)
  silkscreen extent -0.96,0.5 -0.86,0.6, body extent -0.8,-0.43 0.8,0.43, height 0.65
SOT90P240X110-3N [mm] "SOT23, 3-Leads, Body 2.90x2.40mm, Pitch 0.90mm, IPC Medium Density"
  rect 0.9x0.8 smd: 1(-1,0.9) 2(-1,-0.9) 3(1,0)
  silkscreen extent -1.12,-1.45 0.65,1.97, body extent -1.2,-1.45 1.2,1.45, height 1.1
SOT95P237X111-3N [mm] "SOT23, 3-Leads, Body 2.92x2.37mm, Pitch 0.95mm, IPC Medium Density"
  rect 1x0.8 smd: 1(-1.2,0.95) 2(-1.2,-0.95) 3(1.2,0)
  silkscreen extent -1.32,-1.5 0.7,2.02, body extent -1.32,-1.52 1.32,1.52, height 1.11
SOT95P280X145-5N [mm] "SOT23, 5-Leads, Body 2.95x2.80mm, Pitch 0.95mm, IPC Medium Density"
  rect 1.1x0.6 smd: 1(-1.25,0.95) 2(-1.25,0) 3(-1.25,-0.95) 4(1.25,-0.95) 5(1.25,0.95)
  silkscreen extent -1.38,-1.55 0.7,1.92, body extent -1.4,-1.55 1.4,1.55, height 1.45
SOT95P285X130-5N [mm] "SOT23, 5-Leads, Body 3.00x2.85mm, Pitch 0.95mm, IPC Medium Density"
  rect 1.05x0.6 smd: 1(-1.375,0.95) 2(-1.375,0) 3(-1.375,-0.95) 4(1.375,-0.95) 5(1.375,0.95)
  silkscreen extent -1.5,-1.55 0.45,1.92, body extent -1.5,-1.55 1.5,1.55, height 1.3
STM-LQFP64_M [mm] "Thin QFP, 64-Leads, Body 10x10mm, Pitch 0.5mm, IPC Low Density"
  oval 2.1x0.3 smd: 1(-5.6,3.75) 2(-5.6,3.25) 3(-5.6,2.75) 4(-5.6,2.25) 5(-5.6,1.75) 6(-5.6,1.25) 7(-5.6,0.75) 8(-5.6,0.25) 9(-5.6,-0.25) 10(-5.6,-0.75) 11(-5.6,-1.25) 12(-5.6,-1.75) 13(-5.6,-2.25) 14(-5.6,-2.75) 15(-5.6,-3.25) 16(-5.6,-3.75) 33(5.6,-3.75) 34(5.6,-3.25) 35(5.6,-2.75) 36(5.6,-2.25) 37(5.6,-1.75) 38(5.6,-1.25) 39(5.6,-0.75) 40(5.6,-0.25) 41(5.6,0.25) 42(5.6,0.75) 43(5.6,1.25) 44(5.6,1.75) 45(5.6,2.25) 46(5.6,2.75) 47(5.6,3.25) 48(5.6,3.75)
  oval 0.3x2.1 smd: 17(-3.75,-5.6) 18(-3.25,-5.6) 19(-2.75,-5.6) 20(-2.25,-5.6) 21(-1.75,-5.6) 22(-1.25,-5.6) 23(-0.75,-5.6) 24(-0.25,-5.6) 25(0.25,-5.6) 26(0.75,-5.6) 27(1.25,-5.6) 28(1.75,-5.6) 29(2.25,-5.6) 30(2.75,-5.6) 31(3.25,-5.6) 32(3.75,-5.6) 49(3.75,5.6) 50(3.25,5.6) 51(2.75,5.6) 52(2.25,5.6) 53(1.75,5.6) 54(1.25,5.6) 55(0.75,5.6) 56(0.25,5.6) 57(-0.25,5.6) 58(-0.75,5.6) 59(-1.25,5.6) 60(-1.75,5.6) 61(-2.25,5.6) 62(-2.75,5.6) 63(-3.25,5.6) 64(-3.75,5.6)
  silkscreen extent -5.72,-4.15 4.15,4.58, body extent -5,-5 5,5, height 1.6
SW1825910-6 [mm]
  rect 1.498x1.498 hole 0.99: 1(-3.25,2.25)
  round 1.498 hole 0.99: 2(3.25,2.25) 3(-3.25,-2.25) 4(3.25,-2.25)
  silkscreen extent -4.54,-3 3,3, body extent -3.9,-3 3.9,3, height 5.01
TSOP65P210X110-6N [mm] "TSOP, 6-Leads, Body 2.00x1.25mm, Pitch 0.65mm, IPC Medium Density"
  oval 0.85x0.4 smd: 1(-1.125,0.65) 2(-1.125,0) 3(-1.125,-0.65) 4(1.125,-0.65) 5(1.125,0.65)
  silkscreen extent -1.25,-1.1 0.3,1.52, body extent -0.83,-1.1 0.83,1.1, height 1.1
TSOP65P400X110-8N [mm] "TSOP, 8-Leads, Body 3.00x3.00mm, Pitch 0.65mm, IPC Medium Density"
  oval 0.9x0.5 smd: 1(-2,0.975) 2(-2,0.325) 3(-2,-0.325) 4(-2,-0.975) 5(2,-0.975) 6(2,-0.325) 7(2,0.325) 8(2,0.975)
  silkscreen extent -2.13,-1.55 1.15,1.9, body extent -1.99,-1.55 1.99,1.55, height 1.1
TSOP65P490X108-8N [mm] "TSOP, 8-Leads, Body 3.00x3.00mm, Pitch 0.65mm, IPC Medium Density"
  oval 0.9x0.5 smd: 1(-2,0.975) 2(-2,0.325) 3(-2,-0.325) 4(-2,-0.975) 5(2,-0.975) 6(2,-0.325) 7(2,0.325) 8(2,0.975)
  silkscreen extent -2.12,-1.55 1.15,1.9, body extent -1.99,-1.55 1.99,1.55, height 1.1
TSOP65P640X110-14N [mm] "TSOP, 14-Leads, Body 5.00x4.40mm, Pitch 0.65mm, IPC Medium Density"
  oval 1.4x0.45 smd: 1(-2.95,1.95) 2(-2.95,1.3) 3(-2.95,0.65) 4(-2.95,0) 5(-2.95,-0.65) 6(-2.95,-1.3) 7(-2.95,-1.95) 8(2.95,-1.95) 9(2.95,-1.3) 10(2.95,-0.65) 11(2.95,0) 12(2.95,0.65) 13(2.95,1.3) 14(2.95,1.95)
  silkscreen extent -3.08,-2.55 1.85,2.85, body extent -2.25,-2.55 2.25,2.55, height 1.1
TSOP65P640X120-14N [mm] "TSOP, 14-Leads, Body 5.00x4.40mm, Pitch 0.65mm, IPC Medium Density"
  oval 1.4x0.45 smd: 1(-2.95,1.95) 2(-2.95,1.3) 3(-2.95,0.65) 4(-2.95,0) 5(-2.95,-0.65) 6(-2.95,-1.3) 7(-2.95,-1.95) 8(2.95,-1.95) 9(2.95,-1.3) 10(2.95,-0.65) 11(2.95,0) 12(2.95,0.65) 13(2.95,1.3) 14(2.95,1.95)
  silkscreen extent -3.07,-2.55 1.85,2.85, body extent -3.2,-2.55 3.2,2.55, height 1.2
TSOP65P640X120-16N [mm] "TSOP, 16-Leads, Body 5.00x4.40mm, Pitch 0.65mm, IPC Medium Density"
  rect 1.5x0.45 smd: 1(-2.9,2.275) 2(-2.9,1.625) 3(-2.9,0.975) 4(-2.9,0.325) 5(-2.9,-0.325) 6(-2.9,-0.975) 7(-2.9,-1.625) 8(-2.9,-2.275) 9(2.9,-2.275) 10(2.9,-1.625) 11(2.9,-0.975) 12(2.9,-0.325) 13(2.9,0.325) 14(2.9,0.975) 15(2.9,1.625) 16(2.9,2.275)
  silkscreen extent -3.03,-2.55 1.85,3.17, body extent -3.2,-2.55 3.2,2.55, height 1.2
XTAL_ASFLMB-24.000MHZ-XY-T [mm]
  rect 1.1x1.2 smd: 1(-1.15,1.27) 2(-1.15,-1.27) 3(1.15,-1.27) 4(1.15,1.27)
  silkscreen extent -2.35,-2.5 1.6,2.5

## Part data
+3v3 +5V +12V +24V: library part CMP-008-000005-1, "PC TEST POINT MULTIPURPOSE RED", Manufacturer="Keystone Electronics", Link=https://www.digikey.com.au/en/products/detail/keystone-electronics/5010/255332, MPN=5010, SPN=36-5010-ND, Supplier=Digi-Key
"AS SDC" "AS SDC FLT" "AS TS" ASMS BMS BSPD "C1 RX" "C1 TX" "C2 RX" "C2 TX" IMD "Q1 OUT" ROTR1 ROTR2 ROTR3 ROTR4 "RST SW" SDC "SDC CHK" "SDC CLS" "SDC IN" "SDC OUT" "SDC WDO" TP14 TP16 TP20 "TS SW" "WDG CTL" WDO: library part CMP-008-000006-1, "PC TEST POINT MULTIPURPOSE WHITE", Manufacturer="Keystone Electronics", Link=https://www.digikey.com.au/en/products/detail/keystone-electronics/5012/255334, MPN=5012, SPN=36-5012-ND, Supplier=Digi=Key
C1 C2 C3 C4 C5 C6 C7 C8 C11 C14 C17 C18 C19 C20 C22 C23 C24 C25 C28 C29 C32 C33 C34 C35 C36 C37 C38 C39 C40 C41 C42 C43 C44 C45 C46 C47: library part CMP-001-00001-2, "CAP CER 0.1UF 50V X7R 0603", Manufacturer="Samsung Electro-Mechanics", Link=https://www.digikey.com.au/en/products/detail/samsung-electro-mechanics/CL10B104KB8NNWC/3887593, MPN=CL10B104KB8NNWC, SPN=1276-1935-1-ND, Supplier=Digi-Key
C9: "Capacitor", Capacitance=10uF, Manufacturer_Name=KEMET, Mouser Part Number=80-C1210C106K3RAUTO, Arrow Part Number=C1210C106K3RACAUTO, Arrow Price/Stock=https://www.arrow.com/en/products/c1210c106k3racauto/kemet-corporation?region=nac, Datasheet Link=https://content.kemet.com/datasheets/KEM_C1023_X7R_AUTO_SMD.pdf, Manufacturer_Part_Number=C1210C106K3RACAUTO, Mouser Price/Stock=https://www.mouser.co.uk/ProductDetail/KEMET/C1210C106K3RACAUTO?qs=NTrgPOIy7tfjvW8dE3JM6w%3D%3D
C10: library part CMP-00018-2, "CAP CER 10UF 16V X5R 0805", Manufacturer="Samsung Electro-Mechanics", Link=https://www.digikey.com.au/en/products/detail/samsung-electro-mechanics/CL21A106KOQNNNE/3886754?s=N4IgTCBcDaIIxgOwDYC0cAMBONdUDkAREAXQF8g, MPN=CL21A106KOQNNNE, SPN=1276-1096-1-ND, Supplier=Digi-Key
C12 C13 C15: library part CMP-00018-1, "CAP CER 10UF 16V X5R 0805", Manufacturer="Samsung Electro-Mechanics", MPN=CL21A106KOQNNNE, SPN=1276-1096-1-ND, Supplier=Digi-Key
C16: library part CMP-001-00004-1, "CAP CER 22UF 6.3V X5R 0805 / Cap Ceramic 22uF 6.3V X5R 20% Pad SMD 0805 85¡ãC T/R", Case/Package=0805, Dielectric=X5R, Manufacturer="Samsung Electro-Mechanics", MPN=CL21A106KOQNNNE, Tolerance=20%, Voltage Rating (DC)=6.3V, Lead Free="Lead Free", Link=https://www.digikey.com.au/en/products/detail/samsung-electro-mechanics/CL21A106KOQNNNE/3886754?s=N4IgTCBcDaIIxgOwDYC0cAMBONdUDkAREAXQF8g, SPN=1276-1096-1-ND, Supplier=Digi-Key
C21: library part CMP-001-00000-1, "CAP CER 4.7UF 25V X5R 0805", Manufacturer="Samsung Electro-Mechanics", Link=https://www.digikey.com.au/en/products/detail/samsung-electro-mechanics/CL21A475KAQNNNE/3886902, MPN=CL21A475KAQNNNE, SPN=1276-1244-1-ND, Supplier=Digi-Key
C26 C27: library part CMP-00065-1, "Multilayer Ceramic Capacitor, 3900 pF, 50 V, ± 5%, C0G (NP0), 0603 [1608 Metric]", Case Code (Imperial)=0603, Case Code (Metric)=1608, Dielectric=C0G, Max Operating Temperature=125°C, Min Operating Temperature=-55°C, Package Quantity=4000, Ratings=AEC-Q200, Tolerance=5%, Voltage Rating=50V, Case/Package=0603, Height=0.8mm, Lead Free="Lead Free", Length=0.063inch, Mounting Technology="Surface Mount", Packaging="Tape and Reel", RoHS Compliant=Yes, Series=GCM, Termination=SMD/SMT, Thickness=0.035inch, Voltage Rating (DC)=50V, Weight=0.000222oz, Width=0.031inch
C30 C31: library part CMP-001-00005-1, "CAP, 2.2UF, 16V, MLCC, 0603; SVHC: No SVHC (15-Jan-2019) RoHS Compliant: Yes", Case Code (Imperial)=0603, Case Code (Metric)=1608, Dielectric=X5R, Manufacturer="Samsung Electro-Mechanics", Max Operating Temperature=85°C, Min Operating Temperature=-55°C, MPN=CL10B472KB8NNNC, Tolerance=10%, Voltage=16V, Case/Package=0603, Construction=Flat, Depth=0.8mm, Height=0.8mm, Lead Free="Lead Free", Length=1.6mm, Link=https://www.digikey.com.au/en/products/detail/samsung-electro-mechanics/CL10B472KB8NNNC/3886756, Material=Ceramic, Mounting Technology="Surface Mount", Packaging="Tape and Reel", Radiation Hardening=No, RoHS Compliant=Yes, Series=CL, SPN=1276-1098-1-ND, Supplier=Digi-Key, Voltage Rating=16V, Voltage Rating (DC)=16V
D1 D2 D3 D4 D9: library part CMP-004-00000-1, "Zener Diode 16 V 150 mW ±5% Surface Mount SOD-523", Manufacturer="Panjit International Inc.", Link=https://www.digikey.com.au/en/products/detail/panjit-international-inc/PZS1116BES-R1-00001/15800333, MPN=PZS1116BES_R1_00001, SPN=3757-PZS1116BES_R1_00001CT-ND, Supplier=Digi-Key
D5 D6 D7 D8: library part CMP-00024-3, "LED GREEN CLEAR SMD", Manufacturer="Lite-On Inc.", Link=https://www.digikey.com.au/en/products/detail/liteon/LTST-C191KGKT/386835, MPN=LTST-C191KGKT, SPN=160-1446-1-ND, Supplier=Digi-Key
D10: library part CMP-00025-2, "DIODE SCHOTTKY 30V 200MA SOT23-3", Manufacturer=onsemi, Link=https://www.digikey.com.au/en/products/detail/onsemi/BAT54LT1G/918316, MPN=BAT54LT1G, SPN=BAT54LT1GOSCT-ND, Supplier=Digi-Key
F1 F3: library part CMP-00032-2, "FUSE BRD MNT 1A 125VAC/VDC 2SMD", Manufacturer="Littelfuse Inc.", Link=https://www.digikey.com.au/en/products/detail/littelfuse-inc/0154001-DR/183352, MPN=0154001.DR, SPN=F1222CT-ND, Supplier=Digi-Key
F2 F4: library part CMP-2000-05698-1, "NANO2(R) Slo-Blo(R) Fuse, 0.5 A, 125 V, -55 to 125 degC, 2-Pin SMD, RoHS, Tape and Reel", Current Rating=0.5A, Manufacturer=Littelfuse, Operating Temp Range=-55to+125°C, Package Description="2-Pin Surface Mount Device, Body 6.1 x 2.69 mm", Package Reference=0452, Working Voltage-Max=125V, Datasheet URL=http://download.siliconexpert.com/pdfs/2015/7/2/10/39/10/885/ltf_/manual/4322647674859060843226474844920160littelfuse_fuse_452_454_datasheet.pdf.pdf.pdf, Datasheet Version=07/2015, Manufacturer URL=http://www.littelfuse.com/, Mounting Technology=SurfaceMount, Response Characteristic=Slo-Blo, Size=6.10x2.69mm
GND GND2: library part CMP-008-000003-1, "PC TEST POINT MULTIPURPOSE BLACK", Manufacturer="Keystone Electronics", Link=https://www.digikey.com.au/en/products/detail/keystone-electronics/5011/255333, MPN=5011, SPN=36-5011-ND, Supplier=Digi-Key
H1: library part CMP-002-00001-4, "miniSWD Header", Manufacturer="Samtec Inc.", MPN=FTSH-105-01-L-DV-K-P-TR, Link=https://www.digikey.com.au/en/products/detail/samtec-inc/FTSH-105-01-L-DV-K-P-TR/5305483, SPN=SAM13164CT-ND, Supplier=Digi-Key
J1: library part CMP-00014-1, "CONN HEADER R/A 24POS", Manufacturer="TE Connectivity Deutsch Connectors", MPN=DTM13-12PA-12PB-R008, Link=https://www.digikey.com.au/en/products/detail/te-connectivity-deutsch-ict-connectors/DTM13-12PA-12PB-R008/6566695?s=N4IgTCBcDaICIBUCyBGAzAWhWACgQS1wCEQBdAXyA, SPN=1734-1131-ND, Supplier=Digi-Key
J2 J3: library part CMP-04776-000951-1, "CONN HEADER SMD 2POS 3MM", Color=Black, Current Rating=5A, Flammability Rating="UL94 V-0", Insulation Resistance=1GR, Max Operating Temperature=105°C, Min Operating Temperature=-40°C, Package Quantity=1800, Voltage Rating=600V, Voltage Rating (DC)=250V, Contact Material=Brass, Contact Plating=Gold, Depth=5.57mm, Gender=Male, Glow Wire Compliant=Compliant, Halogen Free="Low Halogen", Housing Material=Thermoplastic, Length=13.65mm, Mount="Surface Mount", Number of Circuits=2, Number of Contacts=2, Number of Ports=1, Number of Positions=2, Number of Rows=1, Number of Terminals/Pins=2, Orientation=Vertical, Packaging="Tape and Reel", Pitch=3mm, Radiation Hardening=No, RoHS Compliant=Yes, Series=43650, Termination=Solder
J4: library part CMP-15831-000104-1, "CONN RCPT 6POS 0.05 GOLD PCB", Flammability Rating="UL94 V-0", Insulation Color=Black, Max Operating Temperature=105°C, Min Operating Temperature=-40°C, Connector Type=Receptacle, Contact Finish - Mating=GOLD, Contact Material=Bronze, Contact Plating=Gold, Contact Shape=Square, Contact Type="Female Socket", Depth=3.1mm, Fastening Type=Pull, Gender=Female, Insulation Material=Nylon, Length=4.31mm, Mated Stacking Heights=9.37mm, Number of Positions=6, Number of Rows=2, Orientation=Straight, Packaging=Rail/Tube, Pitch=1.27mm, RoHS Compliant=Yes, Series="Archer M50", Termination=Solder
K1: library part CMP-00027-3, "RELAY GEN PURPOSE SPST 10A 12V", Manufacturer="Omron Electronics Inc-EMC Div", Link=https://www.digikey.com.au/en/products/detail/omron-electronics-inc-emc-div/G5Q-1A4-DC12/355241, MPN="G5Q-1A4 DC12", SPN=Z223-ND, Supplier=Digi-Key
L1: library part CMP-00056-2, "Power Inductors - SMD 2mm x 1.25mm x 0.85mm, -40 to +125 degC, 1000mA, 1uH, 208mO", Manufacturer=TDK, Link=https://au.mouser.com/ProductDetail/TDK/MLP2012S1R0MT0S1?qs=%2FPzWLGNeQ%252Bg5lqpZ20rIgw%3D%3D, MPN=MLP2012S1R0MT0S1, SPN=810-MLP2012S1R0MT0S1, Supplier=Mouser
Q1: library part CMP-013-00001-1, "MOSFET P-CH 30V 3.8A SOT23-3", Manufacturer="Diodes Incorporated", Link=https://www.digikey.com.au/en/products/detail/diodes-incorporated/DMP3098L-7/1964699, MPN=DMP3098L-7, SPN=DMP3098LDICT-ND, Supplier=Digi-Key
Q2: library part CMP-00028-1, "MOSFET N-CH 60V 2A SOT23", Manufacturer="Diodes Incorporated", Link=https://www.digikey.com.au/en/products/detail/diodes-incorporated/DMN6075S-7/5149292, MPN=DMN6075S-7, SPN=DMN6075S-7DICT-ND, Supplier=Digi-Key
R1 R2 R4 R5 R6 R7 R15 R16 R17 R18 R25 R26 R27 R28 R29 R30 R31 R32 R33: library part CMP-00017-5, "RES SMD 10K OHM 5% 1/4W 0603", Manufacturer="Rohm Semiconductor", Link=https://www.digikey.com.au/en/products/detail/rohm-semiconductor/ESR03EZPJ103/1762722, MPN=ESR03EZPJ103, SPN=RHM10KDCT-ND, Supplier=Digi-Key
R3: library part CMP-009-00004-2, "RES 2.2K OHM 1% 1/10W 0603", Manufacturer=YAGEO, Link=https://www.digikey.com.au/en/products/detail/yageo/RC0603FR-072K2L/727016, MPN=RC0603FR-072K2L, SPN=311-2.20KHRCT-ND, Supplier=Digi-Key
R8: library part CMP-2000-00218-1, Manufacturer=Panasonic, Part Number=ERJ-3EKF1210V
R9 R10: library part CMP-2000-00188-1, Manufacturer=Panasonic, Part Number=ERJ-3EKF1051V
R11: library part CMP-009-00008-1, "RES 510 OHM 5% 1/8W 0805", Manufacturer=YAGEO, Link=https://www.digikey.com.au/en/products/detail/yageo/RC0805JR-07510RL/728343, MPN=RC0805JR-07510RL, SPN=311-510ARCT-ND, Supplier=Digi-Key
R12: library part CMP-009-00015-1, "Res Thick Film 0805 80.6 Ohm 1% 1/8W ±100ppm/°C Molded SMD SMD Paper T/R", Case Code (Imperial)=0805, Case Code (Metric)=2012, Manufacturer=YAGEO, Max Operating Temperature=155°C, Max Power Dissipation=125mW, Min Operating Temperature=-55°C, MPN=RC0805FR-07200RL, Package Quantity=1, Temperature Coefficient=100ppm/°C, Tolerance=1%, Voltage Rating=150V, Case/Package=0805, Contact Plating=Tin,Matte, Features="Moisture Resistant", Height=0.024inch, Lead Free="Lead Free", Length=0.079inch, Link=https://www.digikey.com.au/en/products/detail/yageo/RC0805FR-07200RL/727723, Number of Terminations=2, Packaging="Tape and Reel", Power Rating=125mW, RoHS Compliant=Yes, Series=RC, SPN=311-200CRCT-ND, Supplier=Digi-Key, Termination=SMD/SMT, Voltage Rating (DC)=150V, Width=0.049inch
R13: library part CMP-2005-01727-1, Manufacturer=Yageo, Part Number=RC1210JR-07150RL
R14: library part CMP-009-00002-2, "RES 1K OHM 1% 1/8W 0603", Manufacturer="Stackpole Electronics Inc", Link=https://www.digikey.com.au/en/products/detail/stackpole-electronics-inc/RNCP0603FTD1K00/2240106, MPN=RNCP0603FTD1K00, SPN=RNCP0603FTD1K00CT-ND, Supplier=Digi-Key
R23: library part CMP-009-00013-1, "Thick Film Resistors 1 MOhms 100mW 0603 1%", Manufacturer=YAGEO, Link=https://au.mouser.com/ProductDetail/YAGEO/RC0603FR-071ML?qs=sGAEpiMZZMvdGkrng054t3pr%252BPE%2FADjsD43MFxJGzcQ%3D, MPN=RC0603FR-071ML, SPN=603-RC0603FR-071ML, Supplier=Mouser
R24: library part CMP-009-00014-1, "Thick Film Resistors 2 MOhms 100 mW 0603 1%", Manufacturer=YAGEO, Link=https://au.mouser.com/ProductDetail/YAGEO/RC0603FR-102ML?qs=sGAEpiMZZMvdGkrng054tz1y1XEHv7sNk7dsphdWXPuKRj8%252B%252BghJng%3D%3D, MPN=RC0603FR-102ML, SPN=603-RC0603FR-102ML, Supplier=Mouser
SW1 SW2: library part CMP-00030-3, "SWITCH TACTILE SPST-NO 0.05A 24V", Manufacturer="TE Connectivity ALCOSWITCH Switches", Link=https://www.digikey.com.au/en/products/detail/te-connectivity-alcoswitch-switches/1825910-6/1632536, MPN=1825910-6, SPN=450-1650-ND, Supplier=Digi-Key
U1 U2 U3 U4: library part CMP-001-0003-1, "IC CMOS 1 CIRCUIT SOT25", Manufacturer="Diodes Incorporated", Link=https://www.digikey.com.au/en/products/detail/diodes-incorporated/TLV271CW5-7/4747689, MPN=TLV271CW5-7, SPN=TLV271CW5-7DICT-ND, Supplier=Digi-Key
U5: library part CMP-0062-00603-5, "3A Low Dropout Positive Regulators, 3-pin TO-263, Pb-Free", Manufacturer="Texas Instruments", PackageTopMarking=NSUZXYTTE#*LM1085*IS-ADJ, PowerWise=N, Code_JEDEC=MO-169-AA, ComponentLink1Description="Datasheet URL", ComponentLink1URL=http://www.ti.com/general/docs/lit/getliterature.tsp?genericPartNumber=LM1085&fileType=pdf, CompType="LDO IC", High-Reliability=Y, PackageDescription="TO-263, Molded, .400 x .390 x .180in, 3 Lead, .1in Pitch, Surface Mount", PackageReference=KTT0003B, PartNumber=LM1085IS-ADJ/NOPB, PinCount=3, RoHS=Y
U6: library part CMP-00055-1, "Linear Voltage Regulator IC Positive Fixed 1 Output 5V 3A DDPAK/TO-263-3", Manufacturer="Texas Instruments", Link=https://au.mouser.com/ProductDetail/Texas-Instruments/LM1085ISX-5.0-NOPB?qs=X1J7HmVL2ZHFZAya9Kdzeg%3D%3D, MPN=LM1085ISX-5.0/NOPB, SPN=926-LM1085ISX50NOPB, Supplier=Mouser
U7: library part CMP-00039-6, "SC189 Series 5.5 V 3 MHz 1.5 A 1Buck Surface Mount Switching Regulator - SOT-23", Link=https://au.mouser.com/ProductDetail/Semtech/SC189ZSKTRT?qs=rBWM4%252BvDhIck0D%2FgoUNMIQ%3D%3D, Maunfacturer=Semtech, MPN=SC189ZSKTRT, SPN=947-SC189ZSKTRT, Supplier=Mouser
U8: library part CMP-00011-2, "IC GATE NAND 2CH 2-INP 8-TSSOP", Manufacturer=Nexperia, Link=https://au.mouser.com/ProductDetail/Nexperia/74HCT2G00DP125?qs=P62ublwmbi9XudN5AZ1K2A%3D%3D, MPN=74HCT2G00DP,125, SPN=771-HCT2G00DP125, Supplier=Mouser
U9: library part CMP-00012-7, "Automotive Schmitt-trigger input dual D-type positive-edge-triggered flip-flops w/ clear and preset 14-WQFN -40 to 125", Manufacturer="Texas Instruments", Link=https://au.mouser.com/ProductDetail/Texas-Instruments/SN74HCS74QBQARQ1?qs=iLbezkQI%252BsjKprXS%252BnKw7A%3D%3D, MPN=SN74HCS74QBQARQ1, SPN=595-SN74HCS74QBQARQ1, Supplier=Mouser
U10: library part CMP-00037-2, "NXP         74HCT08PW,118            AND Gate, HCT Family, 2 Input, 4 Gate, 4.5V to 5.5V, TSSOP-14", Manufacturer=Nexperia, MPN=74HCT08PW,118, Link=https://au.mouser.com/ProductDetail/Nexperia/74HCT08PW118?qs=P62ublwmbi%252B841Sqd09uyw%3D%3D, SPN=771-HCT08PW118, Supplier=Mouser
U11: library part CMP-00038-2, "IC GATE OR 1CH 2-INP 5-TSSOP", Manufacturer=Nexperia, MPN=74AHCT1G32GW,125, Link=https://au.mouser.com/ProductDetail/Nexperia/74AHCT1G32GW125?qs=P62ublwmbi%252BVV1rPKRAsIA%3D%3D, SPN=771-74AHCT1G32GW-G, Supplier=Mouser
U12: library part CMP-00013-6, "IC GATE AND 2CH 2-INP 8-TSSOP", Manufacturer=Nexperia, Link=https://au.mouser.com/ProductDetail/Nexperia/74HC2G08DP125?qs=P62ublwmbi%2F9zKgKimyHlg%3D%3D, MPN=74HC2G08DP,125, PartId=1, SPN=771-HC2G08DP125, Supplier=Mouser
U13: library part CMP-00054-1, "MCU 32-bit STM32F ARM Cortex M4F RISC 1024KB Flash 2.5V/3.3V 64-Pin LQFP Tray", Manufacturer=STMicroelectronics, Link=https://au.mouser.com/ProductDetail/STMicroelectronics/STM32F415RGT6?qs=Z8%252BeY1k3TIInWw2QSLYjXw%3D%3D, MPN=STM32F415RGT6, SPN=511-STM32F415RGT6, Supplier=Mouser
U14: library part CMP-00052-1, "Automotive, 2.1-V to 5.5-V microprocessor supervisor with watchdog timer 8-TSSOP -40 to 105", Manufacturer="Texas Instruments", Link=https://au.mouser.com/ProductDetail/Texas-Instruments/UCC2946TPWRQ1?qs=%252BEXHTxrSws6LDeqFfQ4KYg%3D%3D, MPN=UCC2946TPWRQ1, SPN=595-UCC2946TPWRQ1, Supplier=Mouser
U15: library part CMP-00041-2, "6-ch, 4.5-V to 5.5-V inverters with Schmitt-Trigger inputs 14-SOIC -40 to 85", Manufacturer="Texas Instruments", Link=https://au.mouser.com/ProductDetail/Texas-Instruments/CD40106BM96E4?qs=UFeyouyReuGsJCXwNW9Exg%3D%3D, MPN=CD40106BM96E4, SPN=595-CD40106BM96E4, Supplier=Mouser
U16 U17: library part CMP-00076-1, "3.3-V Automotive CAN Bus Transceivers 8-SOIC -40 to 125"
U18 U19 U20 U21: library part CMP-00033-1, "IC TRANSLATOR UNIDIR 16TSSOP", Manufacturer="Texas Instruments", Link=https://www.digikey.com.au/en/products/detail/texas-instruments/CD40109BPWR/412006, MPN=CD40109BPWR, SPN=296-12163-1-ND, Supplier=Digi-Key
U22: library part CMP-085-000000-1, Package=None, Availability=Unavailable, Component Type=Standard, Design Item ID=ASFLMB-24.000MHZ-XY-T, MP=ASFLMB-24.000MHZ-XY-T, Pin Count=4, Price=None, Source=ASFLMB-24.000MHZ-XY-T.SchLib

## Via types
v1: diameter 20, hole 10, Top Layer to Bottom GND/Signal, tented both sides, 229 vias
v2: diameter 30, hole 15, Top Layer to Bottom GND/Signal, tented both sides, 26 vias
v3: diameter 30, hole 16, Top Layer to Bottom GND/Signal, tented both sides, 1 vias

## Nets (pads, with @x,y where several pads share a name; then routed paths per layer and width w, separated by ;. In a path a pad name is that pad's centre, name@x,y a point inside that pad or via, vN(x,y) a via of type N, cw(c..) or ccw(c..) an arc to the next point about the centre after c; other vN are vias at no path point)
3V3_ROT_1_SIG: U13.37 U20.4 | length 377.7
  Top Layer w8: U20.4@2238.65,2689 2269.18,2689 2322.83,2742.65 U13.37@2322.83,3001.06 ; U13.37@2322.83,3037.06 2322.83,3025.83 U13.37@2324,3027
3V3_ROT_2_SIG: U13.38 U20.5 | length 398.6
  Top Layer w8: U20.5@2238.65,2663.41 2269.18,2663.41 2342.52,2736.75 U13.38@2342.52,3001.06
3V3_ROT_3_SIG: U13.39 U20.11 | length 424.7
  Top Layer w8: U13.39@2362.2,3001.06 2362.2,2711.8 2436.18,2637.82 U20.11@2467,2637.82
3V3_ROT_4_SIG: U13.40 U20.13 | length 365.2
  Top Layer w8: U13.40@2381.89,3001.06 2381.89,2743.58 2436.47,2689 U20.13@2467,2689
3V3_SDC: R17.1 SDC.1 U10.13 U13.28 U21.11 | length 3056.1
  Top Layer w8: SDC.1@1312,1956 1257,1901 1254,1901 ; U10.13@1491.86,1540.82 1437.54,1540.82 1391.72,1495 R17.1@1373,1495 1335.69,1495 cw(c1335.69,1503) 1330.03,1497.34 1254,1573.38 1254,1573.43 1254,1901 ; U13.28@2171.26,3188.63 1666.68,3188.63 cw(c1666.68,3196.63) 1661.03,3190.97 1511.95,3340.05 ccw(c1506.3,3334.39) 1506.3,3342.39 U21.11@1477.83,3342.39 1361.39,3342.39 1254,3235 1254,2809.26 ccw(c1296,2809) 1254,2808.74 1254,2733.24 ccw(c1296,2733) 1254,2732.78 1254,2027 1254,1901
3V3_TS_SWITCH: "TS SW.1" R16.1 U8.2 U13.29 U21.13 | length 2410.4
  Top Layer w8: U21.13@1477.83,3291.2 1535.91,3291.2 1658.17,3168.94 2111.94,3168.94 ; U8.2@1967.74,1809.2 2007.08,1809.2 2007.28,1809 R16.1@2026,1809 2055,1809 2191,1945 ; v1(2094,3151) 2111.94,3168.94 ; U13.29@2136.97,3168.94 2111.94,3168.94 ; U13.29@2171.26,3168.94 2111.94,3168.94
  Bottom GND/Signal w8: v1@2075.5,1829.5 v1(2073,1827) 2073,3130 v1(2094,3151)
3V_ANL_1: U13.15 U19.13 | length 649.5
  Top Layer w8: U19.13@1708.17,3630.8 1712.91,3626.06 2167.94,3626.06 2263.78,3530.22 U13.15@2263.78,3478
3V_ANL_2: U13.16 U19.11 | length 603.7
  Top Layer w8: U19.11@1708.17,3579.61 2186.39,3579.61 2244.09,3521.91 U13.16@2244.09,3478
3V_AS_SDC: "AS SDC.1" U10.6 U12.5 U13.34 | length 2333
  Top Layer w8: 1592,3100 1611.1,3100 1783,2928.1 v1(1783,2832) ; U10.6@1724.14,1643.18 1792.18,1643.18 v1(1824,1675) ; v1(1793,2617) 1793.13,2617 1990.74,2814.61 2108.99,2814.61 2263.78,2969.41 U13.34@2263.78,3037.06
  Bottom GND/Signal w8: v1(1783,2832) 1793,2822 v1(1793,2617) 1790.7,2614.7 1790.7,2608.02 1789,2606.31 1789,1710 v1(1824,1675)
3V_AS_SDC_FAULT: U8.5 U8.6 U12.7 U18.3 | length 1287.8
  Top Layer w8: U18.3@1712.17,2815.61 1764.76,2815.61 1795.38,2785 v1(1822,2785) ; U8.6@1810.26,1834.8 1810.26,1936.81 1817,1943.55 v1(1817,1945.62)
  Top Layer w10: v1(1822,2785) 1884,2785 1964.8,2865.8 U12.7@1998.74,2865.8
  Bottom GND/Signal w8: v1(1817,1945.62) 1817,2776.75 1822,2781.75 v1(1822,2785)
3V_ASMS_SIG: U13.23 U21.4 | length 466.8
  Top Layer w10: U21.4@1706.17,3291.2 1736.7,3291.2 1740.85,3287.06 U13.23@2171.26,3287.06
3V_BMS_FLT: U13.20 U19.4 | length 809.8
  Top Layer w8: U19.4@1479.83,3630.8 1510.35,3630.8 1640.15,3501 1947,3501 2102.44,3345.56 2127.73,3345.56 2128.28,3346.11 U13.20@2171.26,3346.11
3V_BSPD_FLT: U13.21 U19.5 | length 806.9
  Top Layer w8: U19.5@1479.83,3605.2 1510.35,3605.2 1633.56,3482 1940,3482 2095.57,3326.43 U13.21@2171.26,3326.43
3V_IMD_FLT: U13.22 U21.5 | length 469.3
  Top Layer w10: U21.5@1706.17,3316.8 1739.69,3316.8 1749.75,3306.74 U13.22@2171.26,3306.74
3V_SDC_CHECK: "SDC CHK.1" U10.8 U12.6 U13.33 | length 2246.2
  Top Layer w8: U12.6@1998.74,2840.2 2111.95,2840.2 2244.09,2972.35 U13.33@2244.09,3037.06
  Top Layer w10: v1(1469,1731) 1491.86,1708.14 U10.8@1491.86,1668.77 ; v1(1767,2711.54) 1847.54,2711.54 1976.2,2840.2 U12.6@1998.74,2840.2
  Bottom GND/Signal w10: v1(1469,1731) 1469,2034.85 1766.53,2332.37 1766.53,2711.07 v1(1767,2711.54) ; 1727,3099.5 1728.5,3101 1714.59,3087.09 1714.59,2763.95 v1(1767,2711.54) ; v1@1767,2709.87 v1(1767,2711.54)
12V_ASMS_IN: J1.B3 R4.1 R5.2 | length 867.1
  Top Layer w12: R4.1@2529.18,1052.67 R4.1@2531.02,1054.5 ; R4.1@2531.02,1053.52 2531.02,1034.8 2530.98,1034.76 R5.2@2530.98,998.13 2531.96,998.13 2543.68,986.41 2543.68,985.43 2563.1,966 2631,966 2686.67,910.33 2686.67,380.94 J1.B3@2625.12,319.39
12V_ASMS_SIG: ASMS.1 U3.1 U3.4 U21.3 | length 3482.5
  Top Layer w10: v1(1150,3258.45) 1158.29,3243.48 ccw(c1167.04,3248.32) 1159.93,3241.29 1160,3241.22 1160,1469.72 1345.72,1284 2444,1284 2466.4,1261.6 U3.4@2466.4,1223.26
  Top Layer w12: U21.3@1706.17,3265.61 1738.77,3265.61 1741,3263.38 ; ASMS.1@2389.6,1033.4 2389.6,1112.99 U3.1@2391.6,1114.99 2391.6,1139.6 2466.4,1214.4 U3.4@2466.4,1223.26
  Bottom GND/Signal w10: v1(1150,3258.45) v1@1151.91,3260.36
  other v1: 1752,3262.38
12V_BMS_FAULT: BMS.1 U1.1 U1.4 U19.3 | length 4181.3
  Top Layer w10: 1444.5,3653.65 1180,3389.15 1180,1478 1354,1304 2658.86,1304 cw(c2658.86,1294) 2665.93,1301.07 v1(2672,1295) ; v1(2809.79,1114) 2831.59,1114 U1.1@2832.6,1112.99 ; U1.4@2907.4,1221.26 2907.4,1223.31 2914.21,1230.12 2939.12,1230.12 BMS.1@3005,1296
  Top Layer w12: 1444.5,3653.65 1446.57,3653.65 1449.3,3656.39 U19.3@1479.83,3656.39 ; U1.1@2832.6,1112.99 2832.6,1137.6 2907.4,1212.4 U1.4@2907.4,1221.26